# Altium PCB Driver Main Board-v1.0.PcbDoc (part 1 of 5)
Units mm, origin at the board's own origin, x right, y up, seen from the top; angles counter-clockwise.
Board outline 150 x 100 mm, 4 copper layers (Top Layer, Layer 1, Layer 2, Bottom Layer), stack 1.566 mm thick; 282 components, 222 nets, 936 pads, 397 vias.
Unrouted connection lines stored in the file: 249.
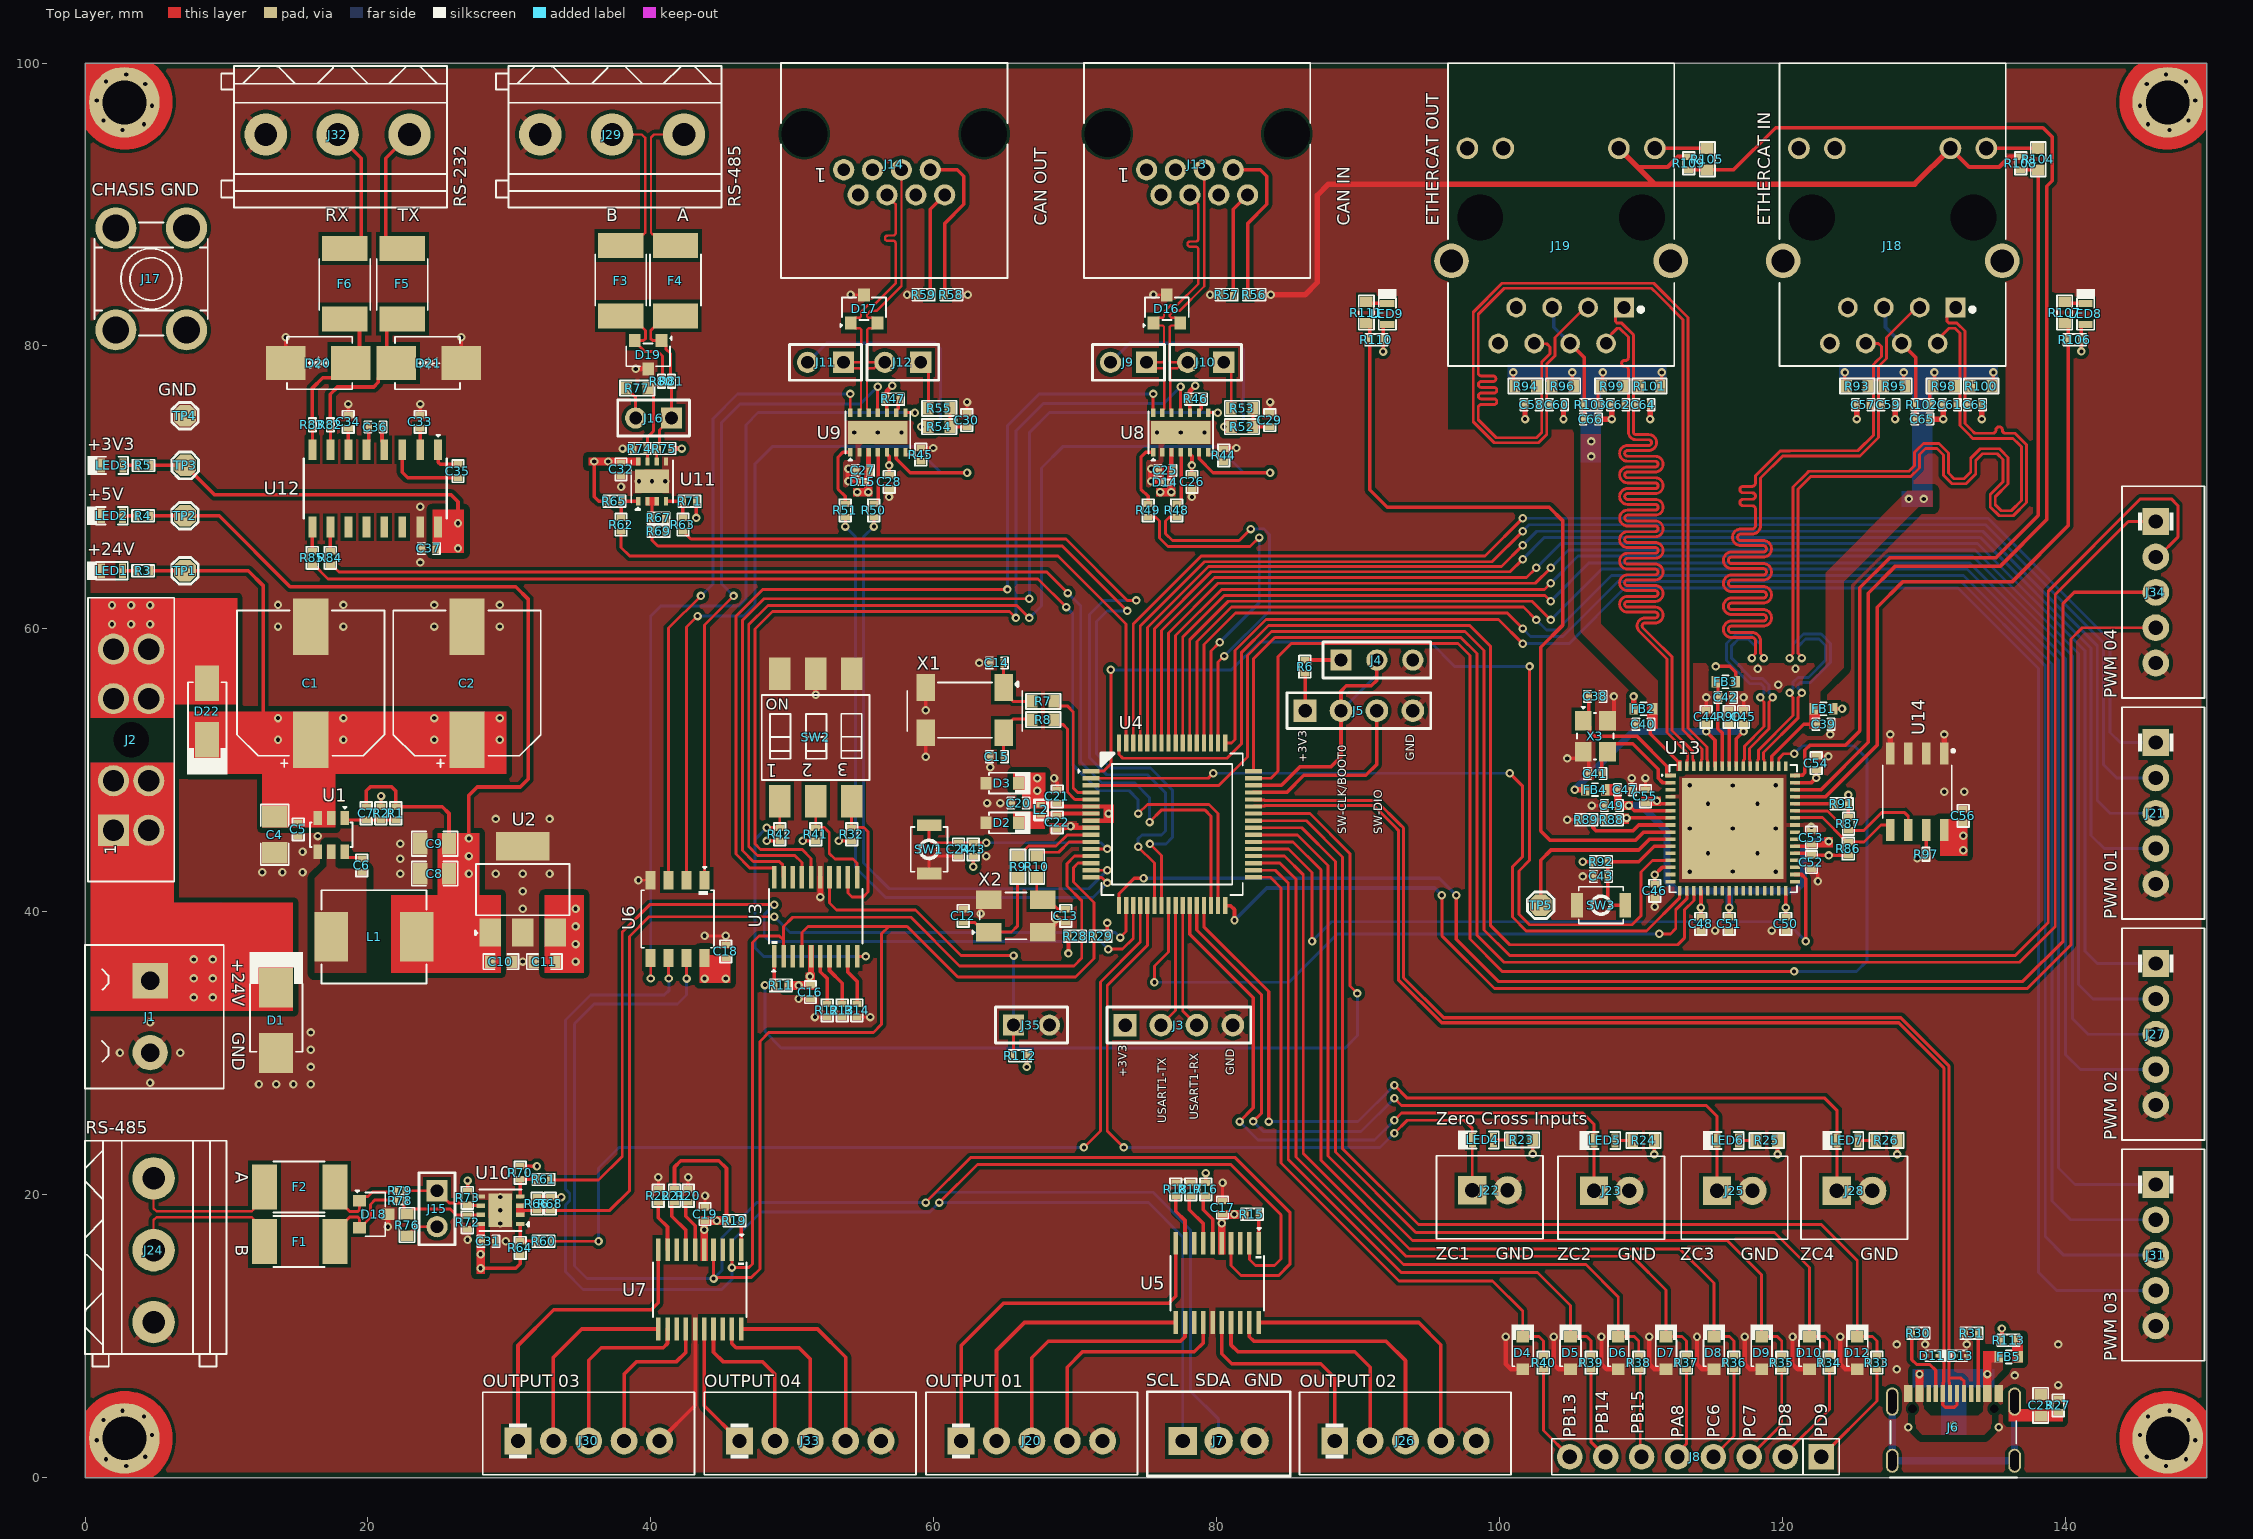
[diagram p0: Top Layer view]
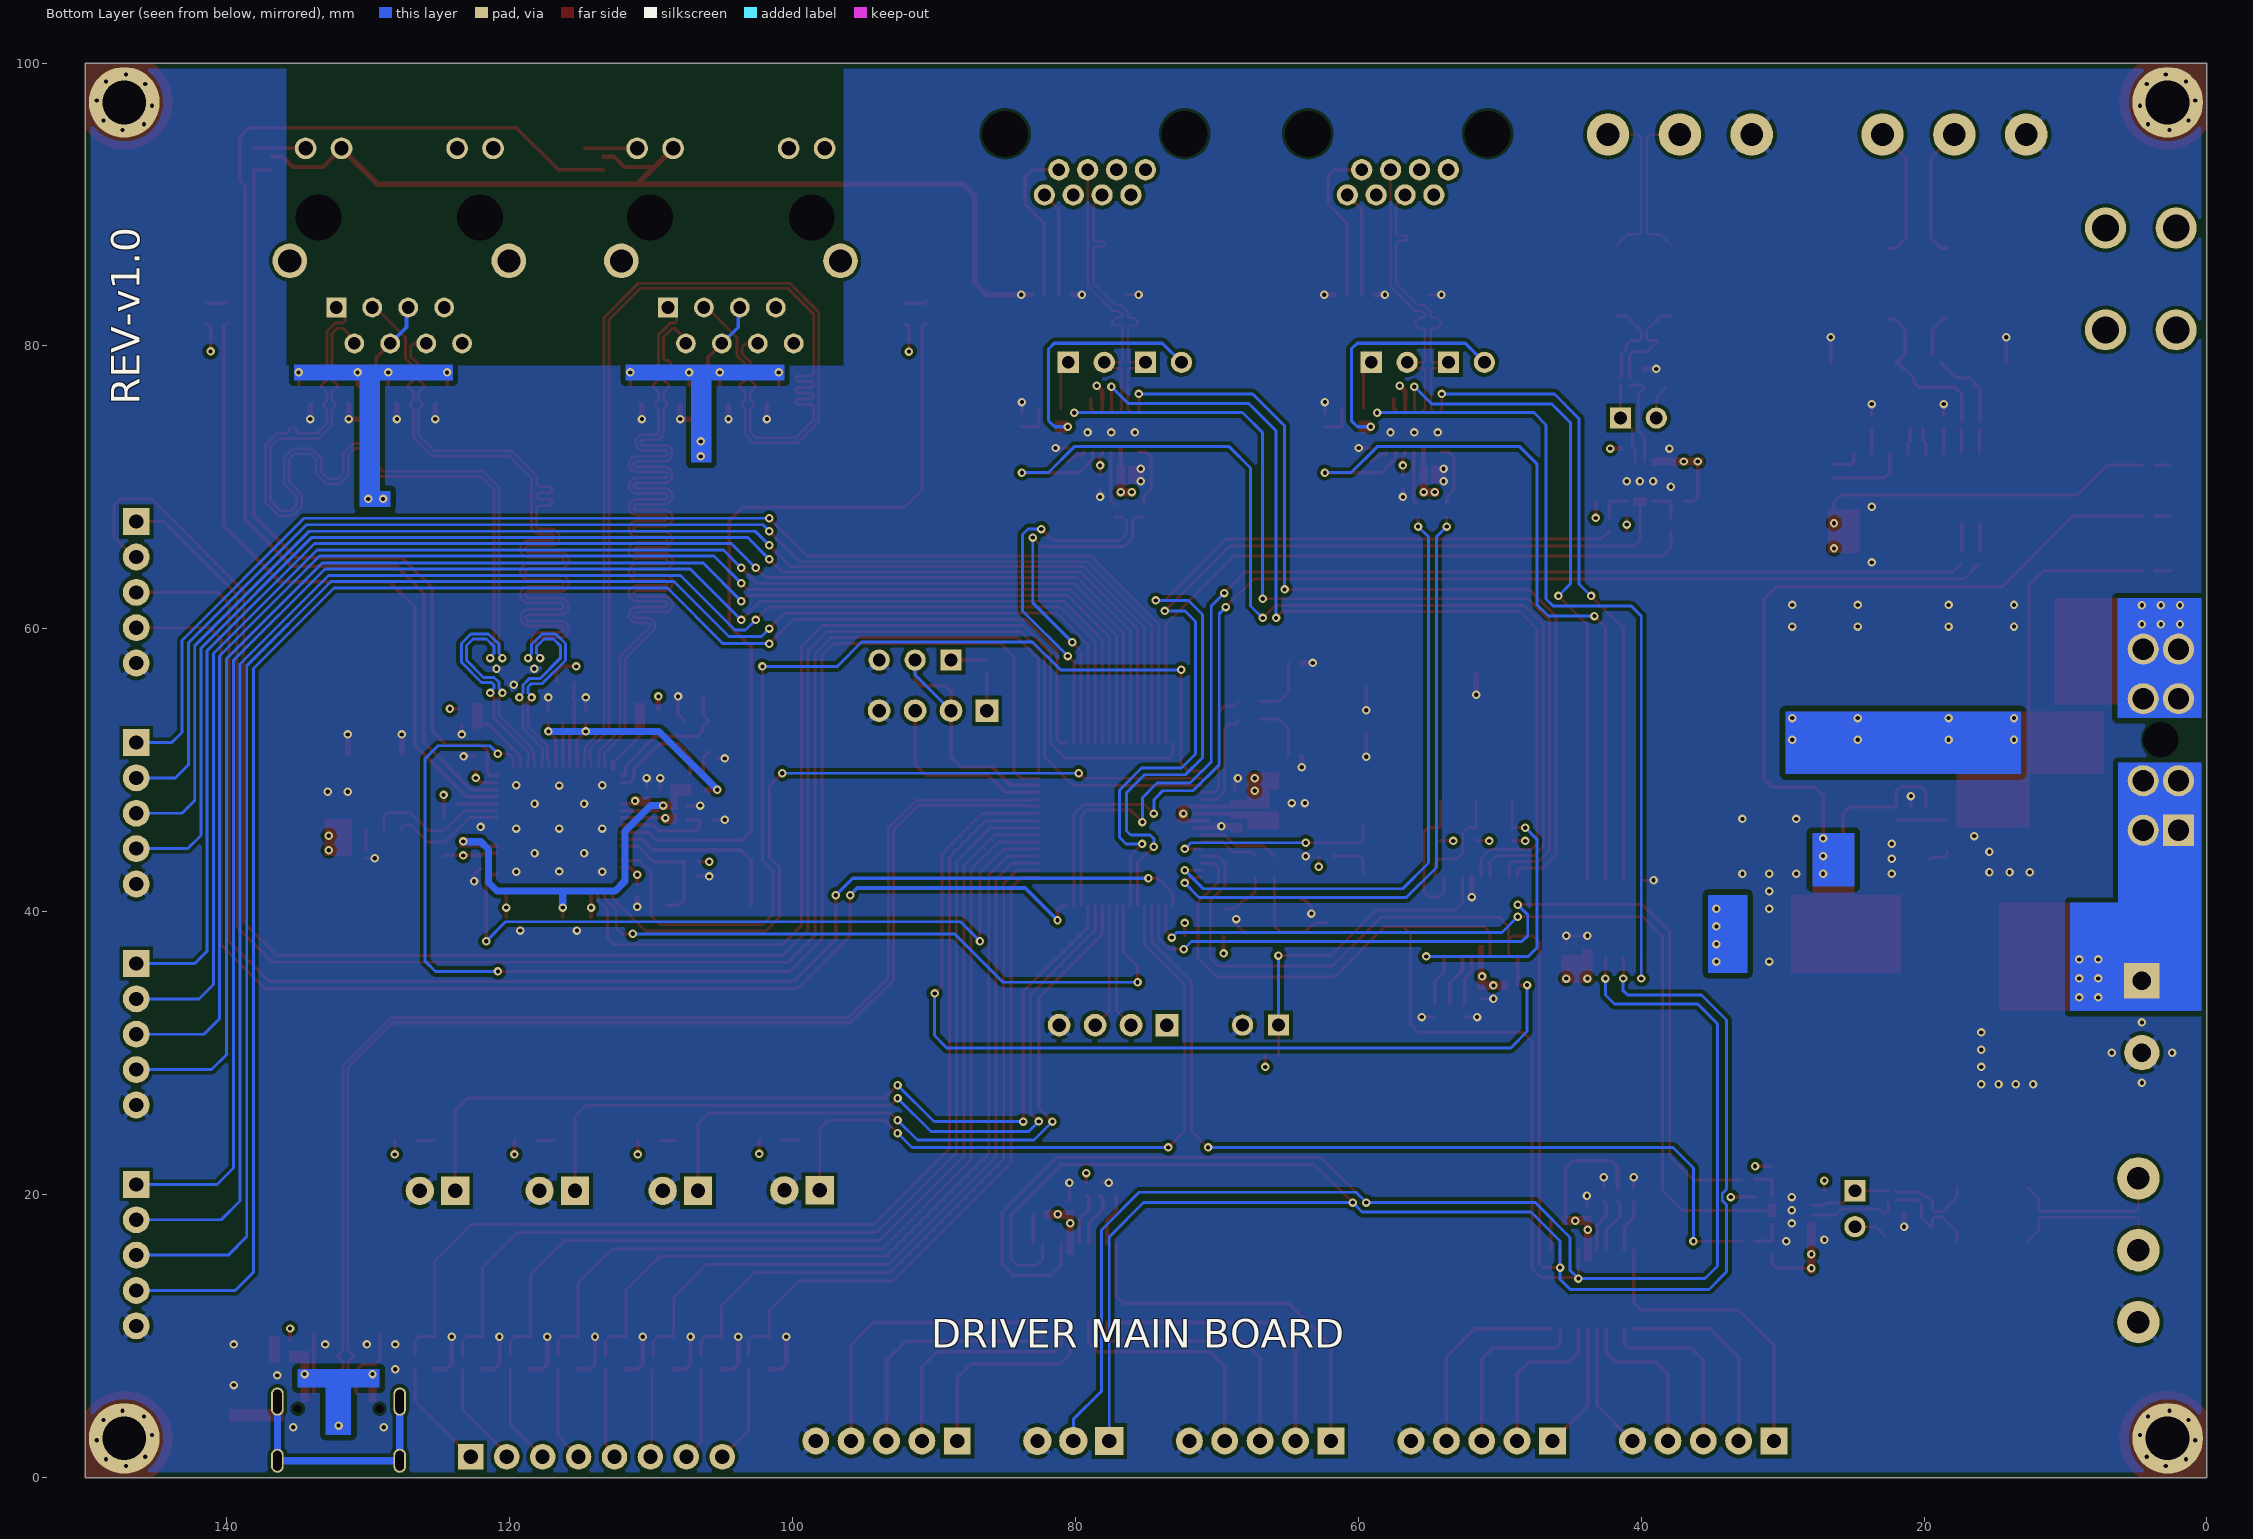
[diagram p1: Bottom Layer view, seen from below]
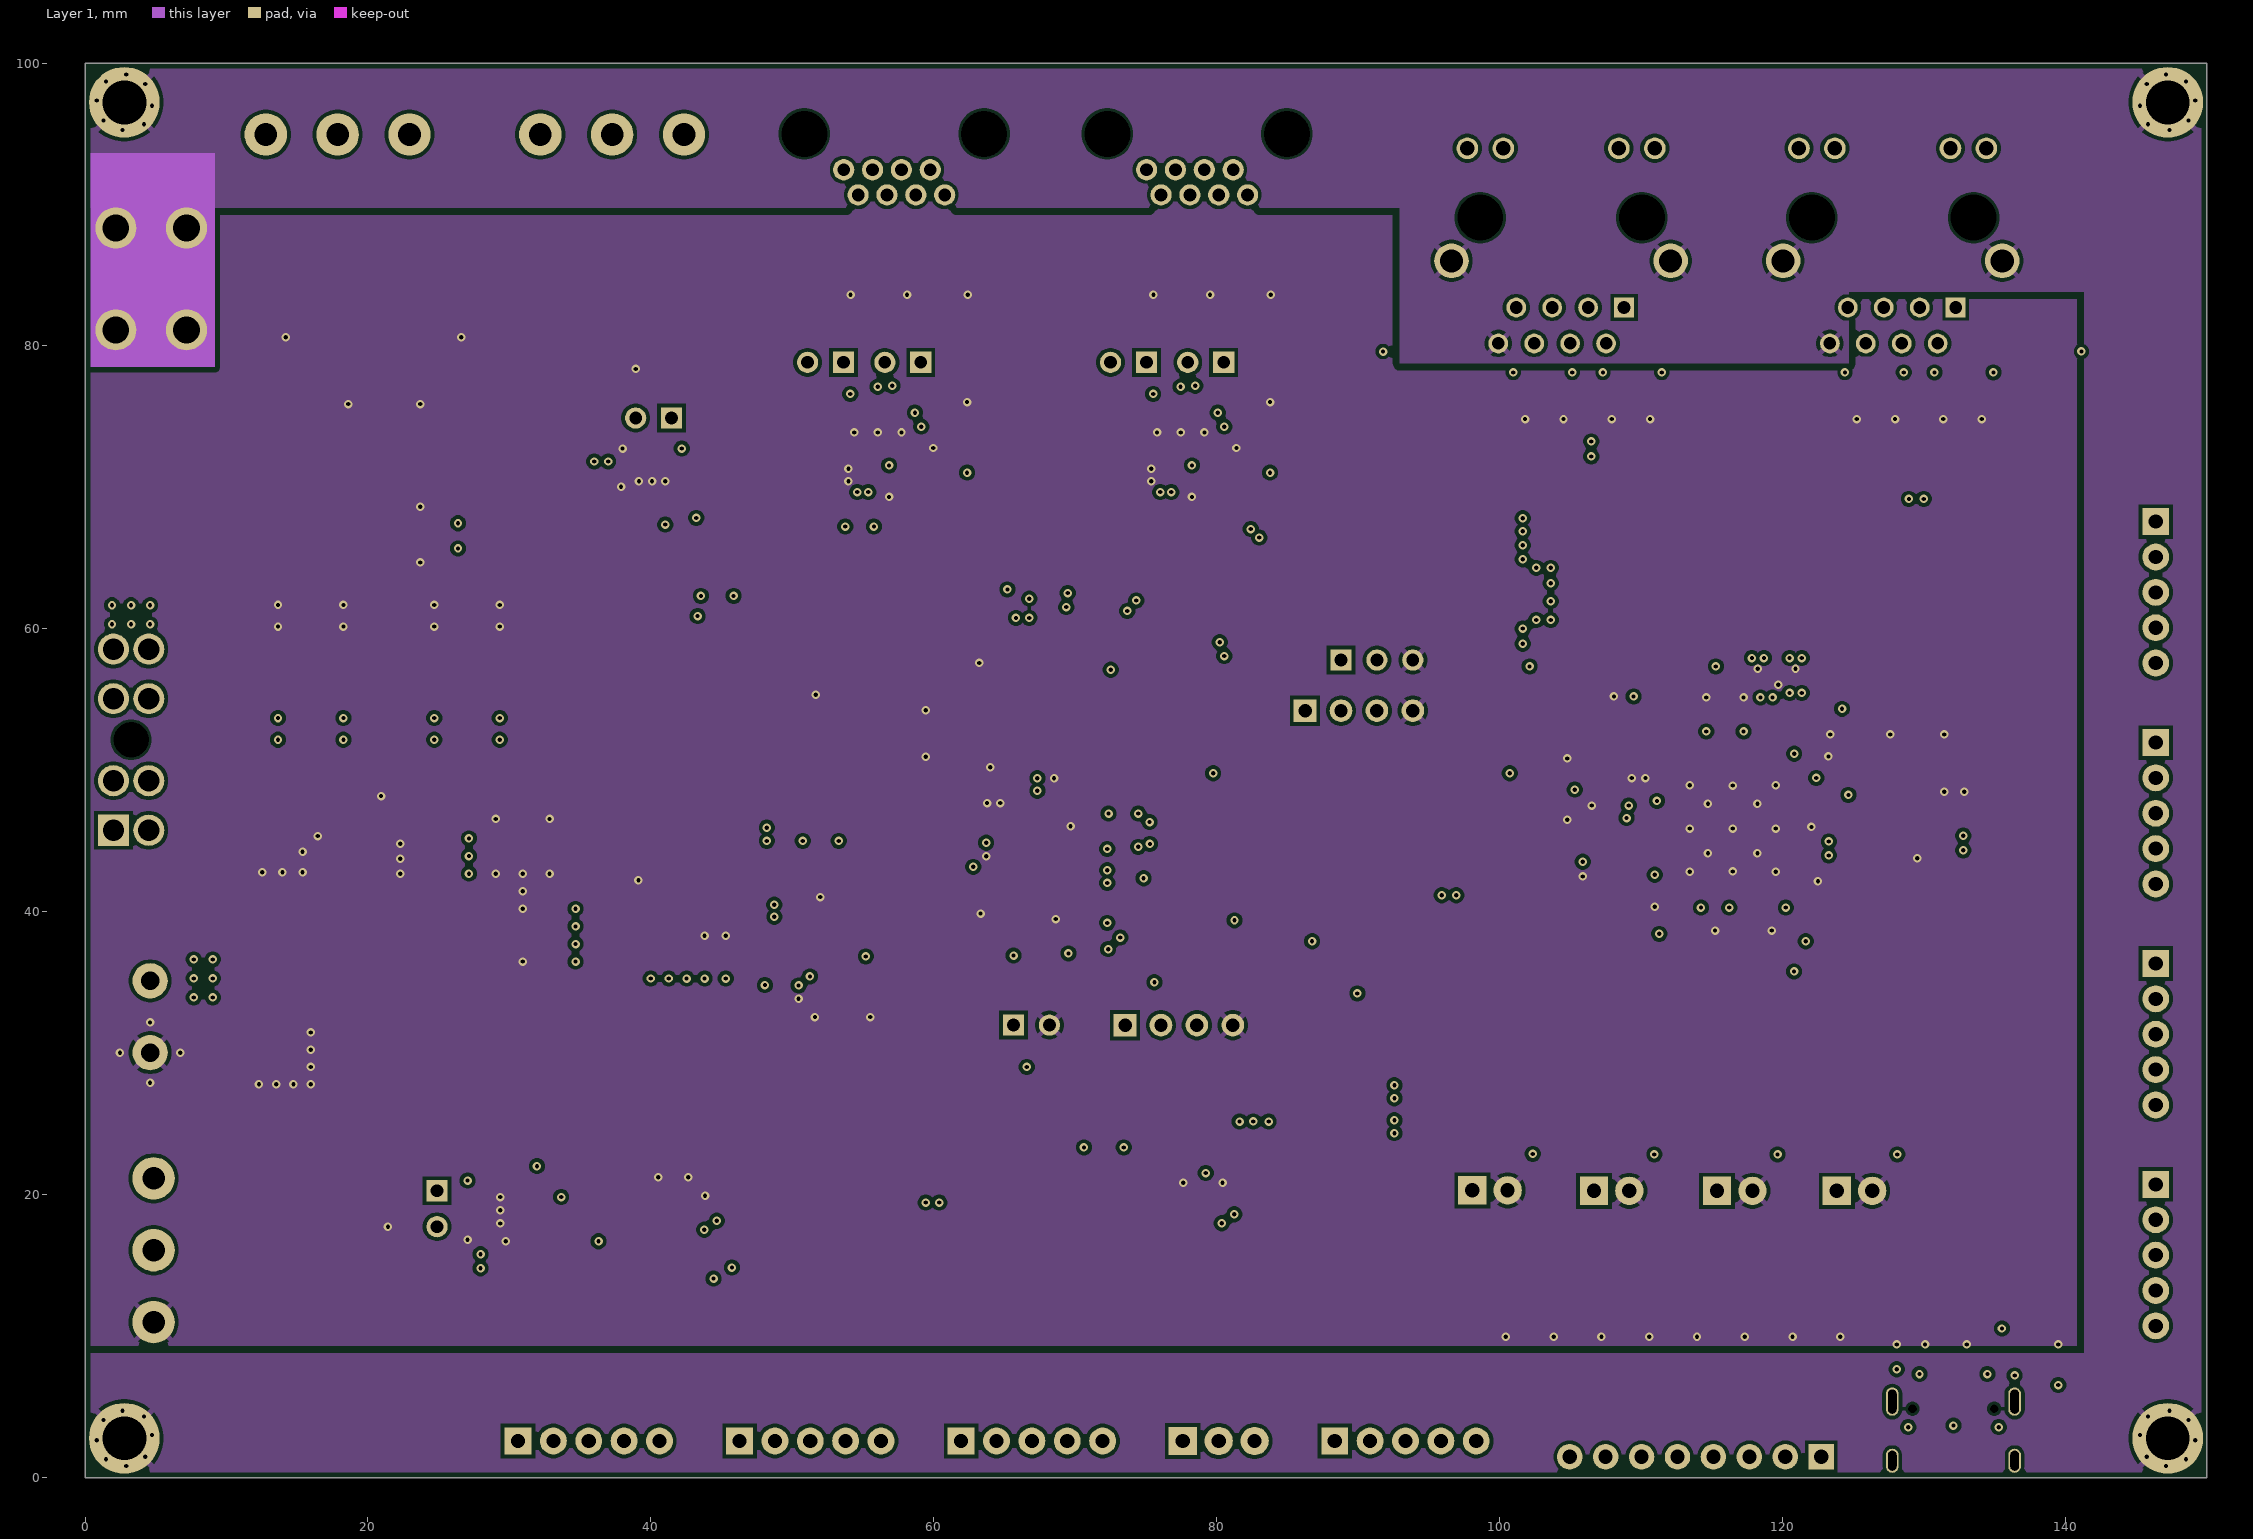
[diagram p2: Layer 1]
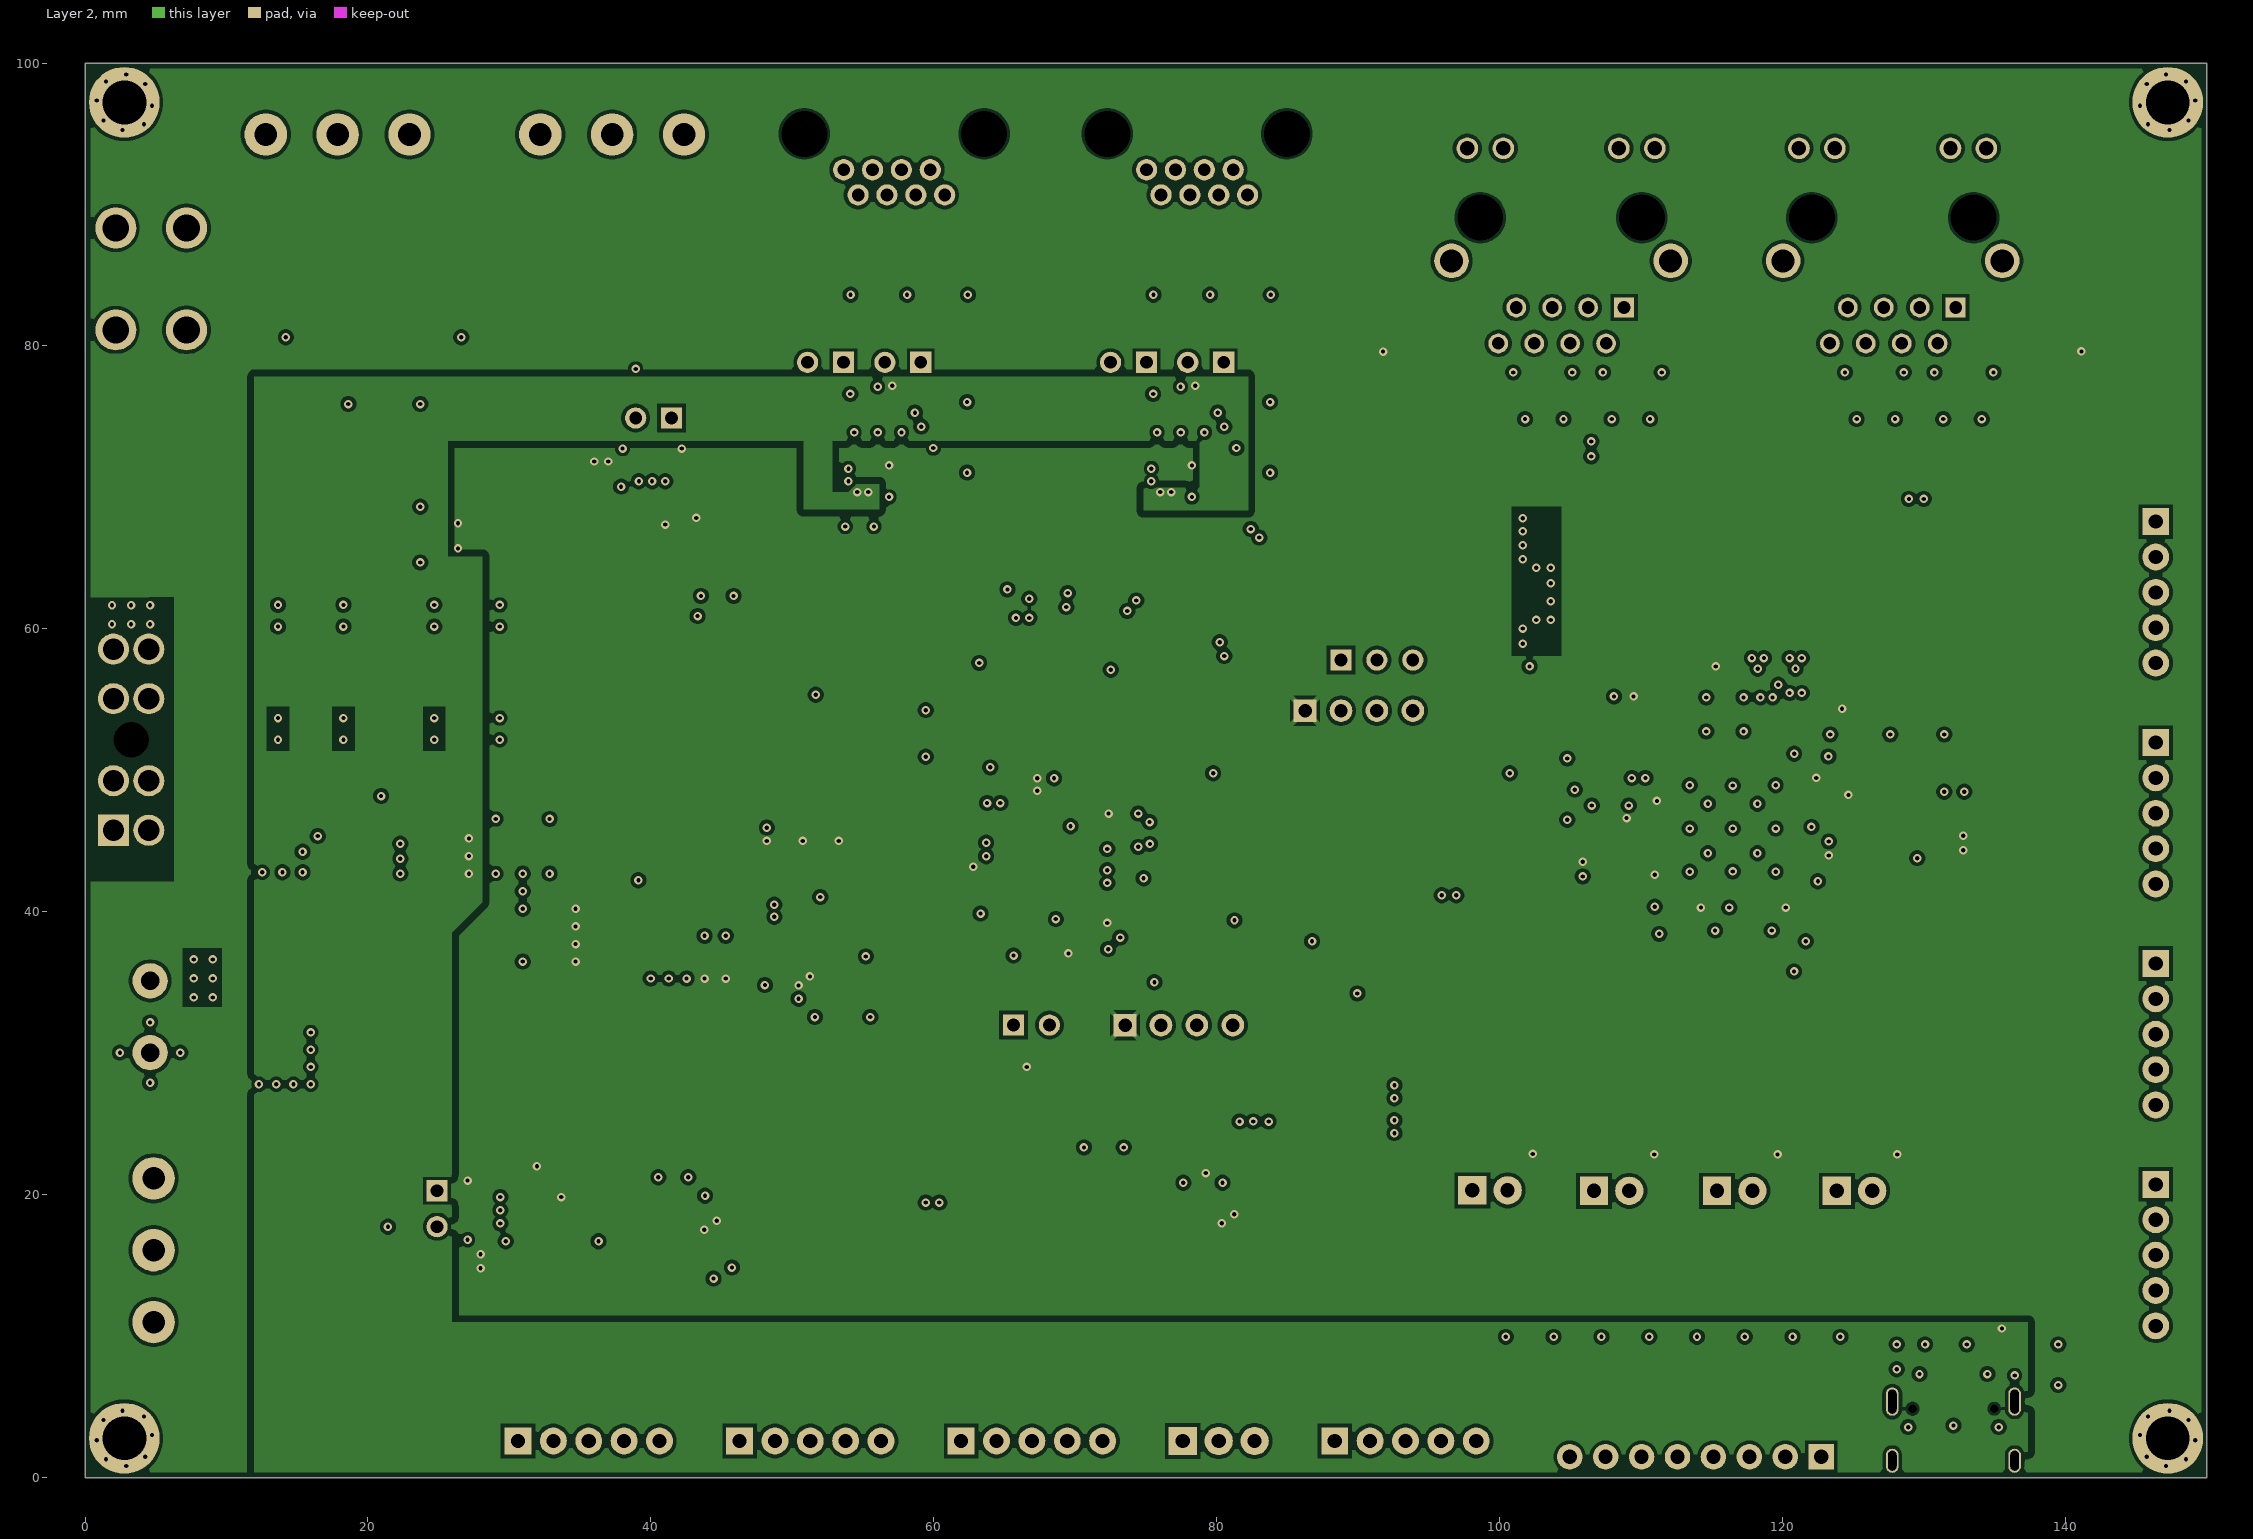
[diagram p3: Layer 2]
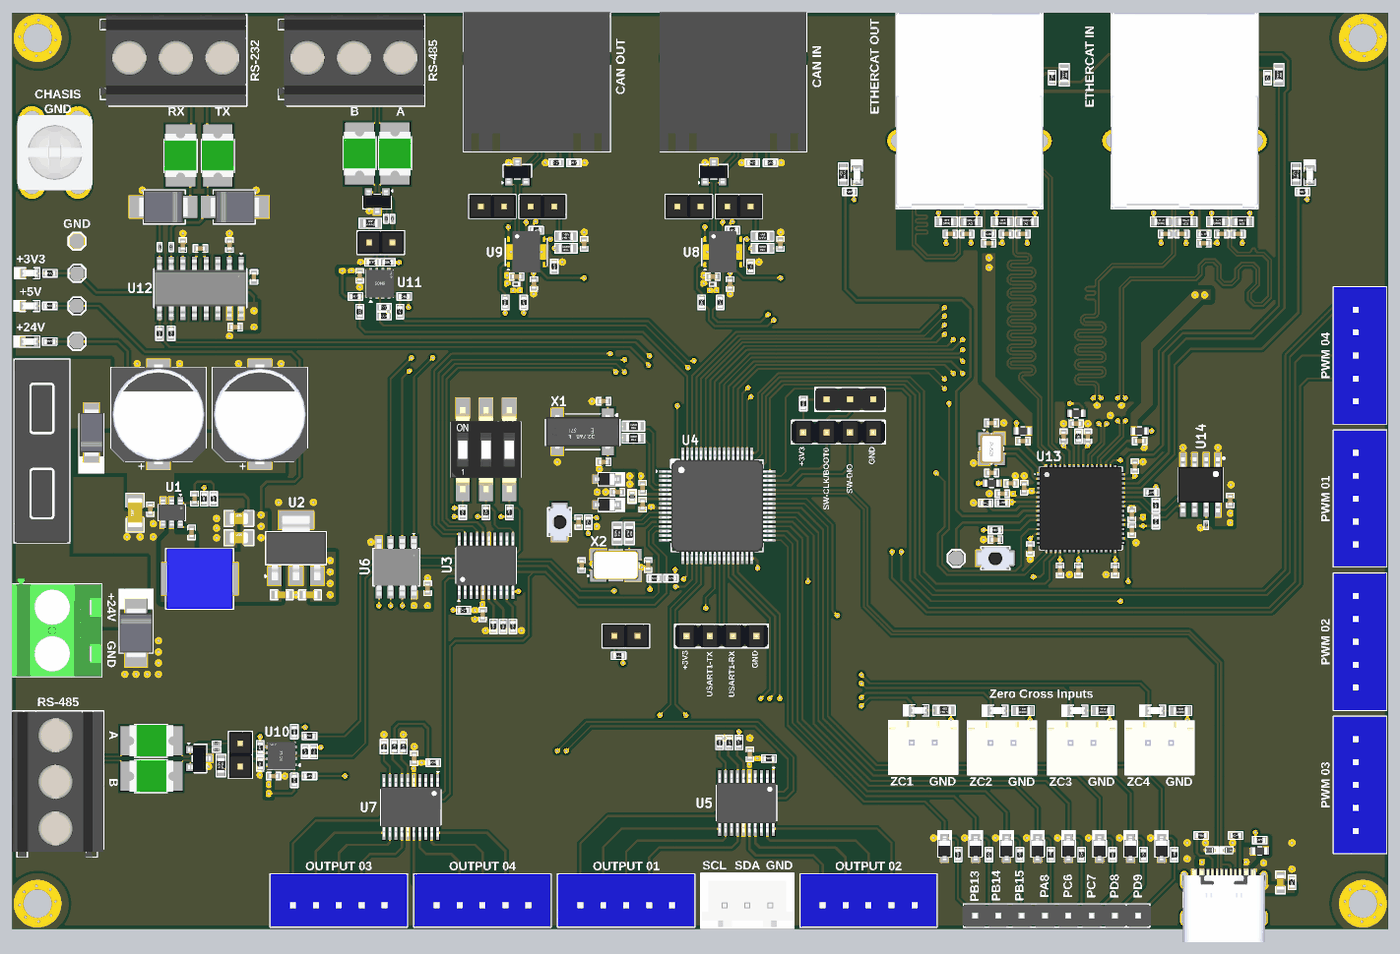
[diagram p6: 3D render of the assembled board from above, using the file's embedded part models]

## Layer stack, top to bottom
Top Solder: solder mask 0.02, Solder Resist, Dk 3.5
Top Layer: signal copper 0.035
Dielectric 2: prepreg 0.203, PP-006, Dk 4.4
Layer 1: signal copper 0.03
Dielectric 1: core 1.03, FR-4, Dk 4.6
Layer 2: signal copper 0.03
Dielectric 3: prepreg 0.203, PP-006, Dk 4.4
Bottom Layer: signal copper 0.035
Bottom Solder: solder mask 0.02, Solder Resist, Dk 3.5

## Board outline
0,0 0,100 150,100 150,0

## Design rules (kind name [scope] priority, off if disabled: settings)
BoardOutlineClearance [All] p1: gap=0 ignorepadtopadclearanceinfootprint=FALSE except(0.127: Fill-OutlineEdge; 0.381: Poly-OutlineEdge)
Clearance Clearance_1 [All] p1: gap=0.254 ignorepadtopadclearanceinfootprint=FALSE except(0.127: Arc-Arc Arc-Track Arc-THPad Track-Track Track-THPad; 0.152: SMDPad-Hole; 0.178: Arc-SMDPad Track-SMDPad SMDPad-SMDPad SMDPad-Fill Fill-Fill Fill-Hole Poly-Hole; 0.203: Track-Via Track-Fill; 0.381: Fill-Poly; 0.508: Poly-Poly)
Clearance [All] p2: gap=0.254 ignorepadtopadclearanceinfootprint=FALSE except(0.127: Arc-Arc Arc-Track Track-Track; 0.152: SMDPad-Hole; 0.178: Arc-SMDPad Track-SMDPad SMDPad-SMDPad SMDPad-Fill Fill-Fill Fill-Hole Poly-Hole; 0.203: Track-Via Track-Fill; 0.508: Poly-Poly)
DiffPairsRouting "RS485 120" [InDifferentialPairClass('RS485_LINES')] p1: maxlimit=0.254 minlimit=0.254 mostfreqgap=0.254 toplayer_minwidth=0.165 toplayer_maxwidth=0.165 toplayer_prefwidth=0.165 bottomlayer_minwidth=0.165 bottomlayer_maxwidth=0.165 bottomlayer_prefwidth=0.165 impedanceprofiledriven=TRUE impedanceprofileid={4FA95F63-EB2B-4DBC-8926-CD3603B1FDB7} impedanceprofilevalue=120.000000 maxuncoupledlength=12.7
DiffPairsRouting "RJ45 100" [InDifferentialPairClass('EtherCAT_A_Lines')] p2: maxlimit=0.254 minlimit=0.152 mostfreqgap=0.254 toplayer_maxgap=0.152 toplayer_prefgap=0.152 toplayer_minwidth=0.203 toplayer_maxwidth=0.203 toplayer_prefwidth=0.203 bottomlayer_maxgap=0.152 bottomlayer_prefgap=0.152 bottomlayer_minwidth=0.203 bottomlayer_maxwidth=0.203 bottomlayer_prefwidth=0.203 impedanceprofiledriven=TRUE impedanceprofileid={8A66B24F-BF74-4DA8-87EC-6CFF0AD57C52} impedanceprofilevalue=100.000000 maxuncoupledlength=12.7
DiffPairsRouting "CAN 120" [InDifferentialPairClass('CAN_Lines')] p3: maxlimit=0.254 minlimit=0.254 mostfreqgap=0.254 toplayer_minwidth=0.165 toplayer_maxwidth=0.165 toplayer_prefwidth=0.165 bottomlayer_minwidth=0.165 bottomlayer_maxwidth=0.165 bottomlayer_prefwidth=0.165 impedanceprofiledriven=TRUE impedanceprofileid={4FA95F63-EB2B-4DBC-8926-CD3603B1FDB7} impedanceprofilevalue=120.000000 maxuncoupledlength=12.7
DiffPairsRouting "USB 90" [InDifferentialPairClass('USB_PROGRAM_LINES')] p4: maxlimit=0.254 minlimit=0.127 mostfreqgap=0.254 toplayer_maxgap=0.127 toplayer_prefgap=0.127 toplayer_minwidth=0.229 toplayer_maxwidth=0.229 toplayer_prefwidth=0.229 bottomlayer_maxgap=0.127 bottomlayer_prefgap=0.127 bottomlayer_minwidth=0.229 bottomlayer_maxwidth=0.229 bottomlayer_prefwidth=0.229 impedanceprofiledriven=TRUE impedanceprofileid={DBDDFF14-6EC2-40F9-9D53-D59472D25E5F} impedanceprofilevalue=90.000000 maxuncoupledlength=12.7
HoleSize [All] p1: absolutevalues=TRUE maxlimit=3.302 minlimit=0.025 maxpercent=80.000 minpercent=20.000
MatchedLengths [InDifferentialPairClass('CAN_Lines')] p1: tolerance=0.508 checknetsindiffpair=TRUE checkdiffpairvsdiffpair=FALSE checkxsignals=FALSE checkothers=FALSE
MatchedLengths "Schematic Matched Net Lengths_2" [InDifferentialPairClass('USB_PROGRAM_LINES')] p2: tolerance=0.508 checknetsindiffpair=TRUE checkdiffpairvsdiffpair=FALSE checkxsignals=FALSE checkothers=FALSE
MatchedLengths "Schematic Matched Net Lengths_1" [InDifferentialPairClass('EtherCAT_A_Lines')] p3: tolerance=0.508 checknetsindiffpair=FALSE checkdiffpairvsdiffpair=TRUE checkxsignals=TRUE checkothers=TRUE
MatchedLengths "Schematic Matched Net Lengths" [InDifferentialPairClass('RS485_LINES')] p4: tolerance=0.508 checknetsindiffpair=TRUE checkdiffpairvsdiffpair=FALSE checkxsignals=FALSE checkothers=FALSE
MaxMinImpedance "Schematic Impedance Constraint_2" [InNetClass('RS485')] p1: minimum=115.0 maximum=125.0
MaxMinImpedance "Schematic Impedance Constraint_1" [InNetClass('EtherCAT_A')] p2: minimum=85.00 maximum=95.00
MaxMinImpedance "Schematic Impedance Constraint" [InNetClass('USB_PROGRAM')] p3: minimum=85.00 maximum=90.00
MinimumSolderMaskSliver [All] p1: minsoldermaskwidth=0
PolygonConnect [All] p1: thpad.connectstyle=Relief thpad.reliefconductorwidth=0.381 thpad.reliefentries=4 thpad.polygonreliefangle="45 Angle" thpad.airgapwidth=0.254 smdpad.connectstyle=Direct smdpad.reliefconductorwidth=0.254 smdpad.reliefentries=4 smdpad.polygonreliefangle="90 Angle" smdpad.airgapwidth=0.254 via.connectstyle=Direct via.reliefconductorwidth=0.254 via.reliefentries=4 via.polygonreliefangle="90 Angle" via.airgapwidth=0.254
RoutingVias [All] p1: holewidth=0.3 width=0.6 viastyle="Through Hole" minholewidth=0.3 minwidth=0.6 maxholewidth=0.3 maxwidth=0.6
SilkToSilkClearance [All] p1: silktosilkclearance=0
SilkToSolderMaskClearance [IsPad] p1: minsilkscreentomaskgap=0 clearancetoexposedcopper=TRUE
SolderMaskExpansion [All] p1: expansion=0.102 istentingtop=FALSE
SupplyNets "Schematic Supply Nets_9" [InNet('VDD33TXRX1')] p1: voltage=0.000
SupplyNets "Schematic Supply Nets_8" [InNet('+3V3')] p2: voltage=0.000
SupplyNets "Schematic Supply Nets_7" [InNet('VDD33TXRX2')] p3: voltage=0.000
SupplyNets "Schematic Supply Nets_6" [InNet('CHASIS GND')] p4: voltage=0.000
SupplyNets "Schematic Supply Nets_5" [InNet('GND')] p5: voltage=0.000
SupplyNets "Schematic Supply Nets_4" [InNet('+5V')] p6: voltage=0.000
SupplyNets "Schematic Supply Nets_3" [InNet('VBUS')] p7: voltage=0.000
SupplyNets "Schematic Supply Nets_2" [InNet('+24V')] p8: voltage=0.000
SupplyNets "Schematic Supply Nets_1" [InNet('VDDCR')] p9: voltage=0.000
SupplyNets "Schematic Supply Nets" [InNet('VDD12TX1')] p10: voltage=0.000
UnRoutedNet [All] p1: checkbadconnections=TRUE
Width [All] p1: maxlimit=0.508 minlimit=0.203 preferedwidth=0.254 midlayer1_minwidth=0.254 midlayer1_maxwidth=0.254 midlayer2_minwidth=0.254 midlayer2_maxwidth=0.254 minimp=50.000000 maximp=50.000000 favimp=50.000000
24 further rules are at their usual default settings.

## Classes and differential pairs
differential pair class USB_PROGRAM_LINES: USB
differential pair class RS485_LINES: RS485 RS485-2
differential pair class EtherCAT_A_Lines: RXA RXB TXA TXB
differential pair class CAN_Lines: CAN1 CAN2
net class USB_PROGRAM: USB_N USB_P
net class RS485: RS485-2_N RS485-2_P RS485_N RS485_P
net class EtherCAT_A: RXA_N RXA_P RXB_N RXB_P TXA_N TXA_P TXB_N TXB_P
net class CAN: CAN1_N CAN1_P CAN2_N CAN2_P
component class U_RS485-RS232-Sheet: C31 C32 C33 C34 C35 C36 C37 D18 D19 D20 D21 F1 F2 F3 F4 F5 F6 J15 J16 R60 R61 R62 R63 R64 R65 R66 R67 R68 R69 R70 R71 R72 R73 R74 R75 R76 R77 R78 R79 R80 R81 R82 R83 R84 R85 U10 U11 U12
component class U_Power_Sheet: C1 C2 C4 C5 C6 C7 C8 C9 C10 C11 D1 D22 J1 J2 L1 LED1 LED2 LED3 R1 R2 R3 R4 R5 TP1 TP2 TP3 TP4 U1 U2
component class U_EtherCAT-Sheet: C38 C39 C40 C41 C42 C43 C44 C45 C46 C47 C48 C49 C50 C51 C52 C53 C54 C55 C56 C57 C58 C59 C60 C61 C62 C63 C64 C65 C66 FB1 FB2 FB3 FB4 J17 J18 J19 LED8 LED9 R86 R87 R88 R89 R90 R91 R92 R93 R94 R95 R96 R97 R98 R99 R100 R101 R102 R103 R104 R105 R106 R107 R108 R109 R110 R111 SW3 TP5 U13 U14 X3
component class U_Controller-Sheet: C12 C13 C14 C15 C16 C17 C18 C19 C20 C21 C22 C23 C24 D2 D3 D4 D5 D6 D7 D8 D9 D10 D11 D12 D13 FB5 J3 J4 J5 J6 J7 J8 J35 L2 LED4 LED5 LED6 LED7 R6 R7 R8 R9 R10 R11 R12 R13 R14 R15 R16 R17 R18 R19 R20 R21 R22 R23 R24 R25 R26 R27 R28 R29 R30 R31 R32 R33 R34 R35 R36 R37 R38 R39 R40 R41 R42 R43 R112 R113 SW1 SW2 U3 U4 U5 U6 U7 X1 X2
component class U_Connector-Sheet: J20 J21 J22 J23 J24 J25 J26 J27 J28 J29 J30 J31 J32 J33 J34
component class U_CAN_Sheet: C25 C26 C27 C28 C29 C30 D14 D15 D16 D17 J9 J10 J11 J12 J13 J14 R44 R45 R46 R47 R48 R49 R50 R51 R52 R53 R54 R55 R56 R57 R58 R59 U8 U9
differential pair USB: +USB_P -USB_N
differential pair TXB: +TXB_P -TXB_N
differential pair TXA: +TXA_P -TXA_N
differential pair RXB: +RXB_P -RXB_N
differential pair RXA: +RXA_P -RXA_N
differential pair RS485: +RS485_P -RS485_N
differential pair RS485-2: +RS485-2_P -RS485-2_N
differential pair CAN2: +CAN2_P -CAN2_N
differential pair CAN1: +CAN1_P -CAN1_N

## Components (designator, comment, footprint, x,y, rotation, side; value= is the part's Value field where it differs from the comment)
C1 "220uF" UCD-220uF-10mmDia 15.951,56.159 r90 top
C2 "220uF" UCD-220uF-10mmDia 27,56.159 r90 top
C4 "10uF" Cap-1206 13.411,45.441 r90 top
C5 "100nF" cap-0402 15.062,45.822 r90 top
C6 "0.1uF" Cap-0402 19.565,43.28 r90 top
C7 "47pF" Cap-0402 19.882,46.966 r90 top
C8 "22uF" Cap-0805 24.714,42.697 r0 top
C9 "22uF" Cap-0805 24.714,44.806 r0 top
C10 "4.7uF" Cap-0603 29.399,36.477 r180 top
C11 "4.7uF" Cap-0603 32.475,36.477 r0 top
C12 "30pF" Cap-0402 62.083,39.715 r270 top
C13 "30pF" Cap-0402 69.322,39.715 r90 top
C14 "DNP" Cap-0402 64.462,57.594 r0 top value=6.8pF
C15 "DNP" Cap-0402 64.462,50.964 r180 top value=6.8pF
C16 "100nF" cap-0402 51.275,34.327 r90 top
C17 "100nF" cap-0402 80.409,19.086 r270 top
C18 "100nF" cap-0402 45.294,37.203 r270 top
C19 "100nF" cap-0402 43.827,18.63 r270 top
C20 "4.7uF" Cap-0402 65.986,47.688 r0 top
C21 "100nF" cap-0402 68.716,48.158 r270 top
C22 "0.1uF" Cap-0402 68.716,46.319 r90 top value=100nF
C23 "4.7nF" Cap-0603 138.243,5.107 r270 top
C24 "0.1uF" Cap-0402 61.749,44.409 r90 top value=100nF
C25 "0.1uF" Cap-0402 76.374,71.196 r180 top value=100nF
C26 "0.1uF" Cap-0402 78.256,70.383 r90 top value=100nF
C27 "0.1uF" Cap-0402 54.99,71.196 r180 top value=100nF
C28 "0.1uF" Cap-0402 56.857,70.383 r90 top value=100nF
C29 "4.7nF" Cap-0402 83.742,74.764 r90 top
C30 "4.7nF" Cap-0402 62.33,74.764 r90 top
C31 "0.1uf" Cap-0402 28.509,16.708 r180 top
C32 "0.1uf" Cap-0402 37.892,71.279 r90 top
C33 "0.1uf" Cap-0402 23.694,74.638 r270 top
C34 "0.1uf" Cap-0402 18.614,74.638 r270 top
C35 "0.1uf" Cap-0402 26.364,71.158 r270 top
C36 "0.1uf" Cap-0402 20.519,74.27 r180 top
C37 "0.1uf" Cap-0402 24.306,65.684 r0 top
C38 "30pF" Cap-0402 106.757,55.223 r180 top
C39 "100nF" cap-0402 122.897,53.257 r180 top
C40 "100nF" cap-0402 110.167,53.257 r0 top
C41 "30pF" Cap-0402 106.757,49.772 r0 top
C42 "100nF" cap-0402 115.982,55.153 r180 top
C43 "100nF" cap-0402 107.165,42.5 r0 top
C44 "100nF" cap-0402 114.603,53.778 r270 top
C45 "100nF" cap-0402 117.241,53.778 r270 top
C46 "100nF" cap-0402 110.967,41.471 r90 top
C47 "1uF" Cap-0402 108.867,48.635 r180 top
C48 "100nF" cap-0402 114.224,39.138 r90 top
C49 "470pF" Cap-0402 107.927,47.51 r0 top
C50 "100nF" cap-0402 120.224,39.138 r90 top
C51 "100nF" cap-0402 116.224,39.138 r90 top
C52 "100nF" cap-0402 122.037,43.513 r90 top
C53 "100nF" cap-0402 122.037,45.247 r270 top
C54 "100nF" cap-0402 122.38,50.514 r270 top
C55 "100nF" cap-0402 110.302,48.165 r270 top
C56 "100nF" cap-0402 132.769,46.78 r270 top
C57 "10pF" Cap-0402 125.703,75.844 r0 top
C58 "10pF" Cap-0402 102.263,75.844 r0 top
C59 "10pF" Cap-0402 127.482,75.844 r180 top
C60 "10pF" Cap-0402 104.042,75.844 r180 top
C61 "10pF" Cap-0402 131.825,75.844 r0 top
C62 "10pF" Cap-0402 108.385,75.844 r0 top
C63 "10pF" Cap-0402 133.603,75.844 r180 top
C64 "10pF" Cap-0402 110.163,75.844 r180 top
C65 "22nF" Cap-0402 129.882,74.828 r180 top
C66 "22nF" Cap-0402 106.442,74.828 r180 top
D1 "SMBJ28A-13-F" SMB_ 13.513,32.32 r90 top value=330pF
D2 "SD03" SOD-323 64.836,46.289 r180 top
D3 "SD03" SOD-323 64.836,49.089 r180 top
D4 "MM3Z3V3" SOD-323 101.63,8.818 r270 top
D5 "MM3Z3V3" SOD-323 105.008,8.818 r270 top
D6 "MM3Z3V3" SOD-323 108.386,8.818 r270 top
D7 "MM3Z3V3" SOD-323 111.765,8.818 r270 top
D8 "MM3Z3V3" SOD-323 115.143,8.818 r270 top
D9 "MM3Z3V3" SOD-323 118.521,8.818 r270 top
D10 "MM3Z3V3" SOD-323 121.899,8.818 r270 top
D11 "ESD9L5.0ST5G" SOD-923. 130.564,8.612 r180 top
D12 "MM3Z3V3" SOD-323 125.277,8.818 r270 top
D13 "ESD9L5.0ST5G" SOD-923. 132.597,8.612 r0 top
D14 "PESD5V0H1BSFYL" DSN0603-2 76.374,70.358 r180 top
D15 "PESD5V0H1BSFYL" DSN0603-2 54.964,70.383 r180 top
D16 "CDSOT23-T24CAN-Q" SOT-23 76.478,82.617 r0 top
D17 "CDSOT23-T24CAN-Q" SOT-23 55.066,82.617 r0 top
D18 "SM712" SOT-23 20.414,18.616 r270 top
D19 "SM712" SOT-23 39.8,79.375 r180 top
D20 "SMBJ8.0CA" "SMB Bi Directional" 16.495,78.791 r0 top
D21 "SMBJ8.0CA" "SMB Bi Directional" 24.295,78.791 r180 top
D22 "SS56" SMA 8.636,54.159 r90 top
F1 "MF-MSMF010-2" Fuse-1812_ 15.182,16.686 r180 top
F2 "MF-MSMF010-2" Fuse-1812_ 15.182,20.547 r180 top
F3 "MF-MSMF010-2" Fuse-1812_ 37.87,84.607 r90 top
F4 "MF-MSMF010-2" Fuse-1812_ 41.731,84.607 r90 top
F5 "MF-MSMF010-2" Fuse-1812_ 22.427,84.403 r270 top
F6 "MF-MSMF010-2" Fuse-1812_ 18.363,84.403 r270 top
FB1 "BLM18PG221SN1D" "IND-0603 (1608 Metric)" 122.897,54.347 r180 top value=100mR
FB2 "BLM18PG221SN1D" "IND-0603 (1608 Metric)" 110.167,54.347 r0 top value=100mR
FB3 "BLM18PG221SN1D" "IND-0603 (1608 Metric)" 115.982,56.254 r180 top value=100mR
FB4 "BLM18PG221SN1D" "IND-0603 (1608 Metric)" 106.757,48.635 r180 top value=100mR
FB5 "BLM18PG221SN1D" "IND-0603 (1608 Metric)" 135.977,8.536 r0 top value=100mR
J1 "1715721" 1715721 4.6,32.583 r270 top
J2 "178.6165.0002" 178.6165.0002 3.257,52.165 r90 top
J3 "X6511WV-04H-C60D30" HDR1X4_ 73.517,31.991 r0 top
J4 "68000-103HLF" HDR1X3_ 88.782,57.797 r0 top
J5 "X6511WV-04H-C60D30" HDR1X4_ 86.242,54.216 r0 top
J6 "TYPE-C-31-M-12" TYPE-C-31-M-12_ 132.077,3.57 r0 top
J7 "B3B-XH-A(LF)(SN)" B3B-XH-A(LF)(SN)_ 81.407,2.591 r0 top
J8 "X6511WV-08H-C60D30" "HDR 1x8 TH male" 113.841,1.475 r180 top
J9 "X6511WV-02H-C60D30" HDR1X2_ 75.03,78.842 r180 top
J10 "X6511WV-02H-C60D30" HDR1X2_ 80.491,78.842 r180 top
J11 "X6511WV-02H-C60D30" HDR1X2_ 53.618,78.842 r180 top
J12 "X6511WV-02H-C60D30" HDR1X2_ 59.079,78.842 r180 top
J13 "X12ADIWA3DY1027" X12ADIWA3DY1027 78.612,92.836 r180 top
J14 "X12ADIWA3DY1027" X12ADIWA3DY1027 57.199,92.836 r180 top
J15 "X6511WV-02H-C60D30" HDR1X2_ 24.884,20.278 r270 top
J16 "X6511WV-02H-C60D30" HDR1X2_ 41.462,74.905 r180 top
J17 "T44001" T44001 4.674,84.734 r0 top
J18 "HR911105A" HR911105A 127.782,87.071 r0 top
J19 "HR911105A" HR911105A 104.342,87.071 r0 top
J20 "B5B-XH-A(LF)(SN)" B5B-XH-A(LF)(SN)_ 66.933,2.591 r0 top
J21 "B5B-XH-A(LF)(SN)" B5B-XH-A(LF)(SN)_ 146.38,46.963 r270 top
J22 "B2B-XH-A(LF)(SN)" B2B-XH-A(LF)(SN)_ 99.316,20.312 r0 top
J23 "B2B-XH-A(LF)(SN)" B2B-XH-A(LF)(SN)_ 107.913,20.277 r0 top
J24 "DB128L-5.08-3P-BK-S" DB128L-5.08-3P-BK-S 4.844,16.076 r270 top
J25 "B2B-XH-A(LF)(SN)" B2B-XH-A(LF)(SN)_ 116.62,20.277 r0 top
J26 "B5B-XH-A(LF)(SN)" B5B-XH-A(LF)(SN)_ 93.341,2.591 r0 top
J27 "B5B-XH-A(LF)(SN)" B5B-XH-A(LF)(SN)_ 146.38,31.345 r270 top
J28 "B2B-XH-A(LF)(SN)" B2B-XH-A(LF)(SN)_ 125.083,20.277 r0 top
J29 "DB128L-5.08-3P-BK-S" DB128L-5.08-3P-BK-S 37.26,94.945 r180 top
J30 "B5B-XH-A(LF)(SN)" B5B-XH-A(LF)(SN)_ 35.604,2.591 r0 top
J31 "B5B-XH-A(LF)(SN)" B5B-XH-A(LF)(SN)_ 146.38,15.726 r270 top
J32 "DB128L-5.08-3P-BK-S" DB128L-5.08-3P-BK-S 17.855,94.945 r180 top
J33 "B5B-XH-A(LF)(SN)" B5B-XH-A(LF)(SN)_ 51.269,2.591 r0 top
J34 "B5B-XH-A(LF)(SN)" B5B-XH-A(LF)(SN)_ 146.38,62.582 r270 top
J35 "X6511WV-02H-C60D30" HDR1X2_ 65.634,31.991 r0 top
L1 "6.8uH" 0630CDMCCDS_6R8MC 20.431,38.227 r0 top
L2 "BLM15AG601SN1D" IND-0402 67.573,47.211 r270 top
LED1 "RED" LED-0603 1.897,64.11 r180 top
LED2 "RED" LED-0603 1.897,67.996 r180 top
LED3 "RED" LED-0603 1.922,71.552 r180 top
LED4 "Emerald" LED-0603 98.816,23.868 r180 top
LED5 "Emerald" LED-0603 107.413,23.833 r180 top
LED6 "Emerald" LED-0603 116.12,23.833 r180 top
LED7 "Emerald" LED-0603 124.583,23.833 r180 top
LED8 "Emerald" LED-0603 141.421,82.259 r90 top
LED9 "RED" LED-0603 92.056,82.259 r90 top
R1 "158K" Res-0402 21.971,46.965 r90 top
R2 "30.1K" Res-0402 20.927,46.965 r270 top
R3 "3.9K" Res-0402 4.106,64.11 r180 top value=3.9kR
R4 "470R" Res-0402 4.106,67.996 r180 top
R5 "200R" Res-0402 4.132,71.552 r180 top
R6 "10K" Res-0402 86.242,57.327 r270 top
R7 "DNP" Res-0603 67.726,54.876 r0 top
R8 "DNP" Res-0603 67.726,53.581 r0 top
R9 "0R" Res-0603 65.953,43.177 r90 top
R10 "0R" Res-0603 67.274,43.177 r90 top
R11 "10K" Res-0402 49.196,34.797 r0 top
R12 "10K" Res-0402 52.466,33.031 r270 top
R13 "10K" Res-0402 53.521,33.031 r270 top
R14 "10K" Res-0402 54.576,33.031 r270 top
R15 "10K" Res-0402 82.488,18.616 r180 top
R16 "10K" Res-0402 79.218,20.381 r90 top
R17 "10K" Res-0402 78.163,20.381 r90 top
R18 "10K" Res-0402 77.108,20.381 r90 top
R19 "10K" Res-0402 45.906,18.16 r180 top
R20 "10K" Res-0402 42.636,19.926 r90 top
R21 "10K" Res-0402 41.666,19.926 r90 top
R22 "10K" Res-0402 40.526,19.926 r90 top
R23 "49.9R" Res-0603 101.575,23.868 r180 top
R24 "49.9R" Res-0603 110.172,23.833 r180 top
R25 "49.9R" Res-0603 118.878,23.833 r180 top
R26 "49.9R" Res-0603 127.342,23.833 r180 top
R27 "1M" Res-0402 139.487,5.107 r90 top
R28 "4.7K" Res-0402 69.99,38.278 r180 top
R29 "4.7K" Res-0402 71.793,38.278 r0 top
R30 "5.1K" Res-0402 129.597,10.212 r0 top
R31 "5.1K" Res-0402 133.357,10.212 r180 top
R32 "10K" Res-0402 54.191,45.479 r270 top
R33 "33R" Res-0402 126.672,8.137 r270 top
R34 "33R" Res-0402 123.305,8.137 r270 top
R35 "33R" Res-0402 119.937,8.137 r270 top
R36 "33R" Res-0402 116.57,8.137 r270 top
R37 "33R" Res-0402 113.203,8.137 r270 top
R38 "33R" Res-0402 109.835,8.137 r270 top
R39 "33R" Res-0402 106.468,8.137 r270 top
R40 "33R" Res-0402 103.101,8.137 r270 top
R41 "10K" Res-0402 51.651,45.479 r270 top
R42 "10K" Res-0402 49.111,45.479 r270 top
R43 "10K" Res-0402 62.79,44.409 r270 top
R44 "100K" Res-0402 80.491,72.27 r270 top
R45 "100K" Res-0402 59.091,72.316 r270 top
R46 "33K" Res-0402 78.533,76.251 r0 top
R47 "33K" Res-0402 57.123,76.251 r0 top
R48 "0R" Res-0402 77.174,68.377 r270 top
R49 "0R" Res-0402 75.156,68.377 r270 top
R50 "0R" Res-0402 55.762,68.377 r270 top
R51 "0R" Res-0402 53.744,68.377 r270 top
R52 "60.4R" Res-0603 81.787,74.294 r0 top
R53 "60.4R" Res-0603 81.787,75.589 r180 top
R54 "60.4R" Res-0603 60.374,74.294 r0 top
R55 "60.4R" Res-0603 60.374,75.589 r180 top
R56 "0R" Res-0402 82.651,83.617 r180 top
R57 "0R" Res-0402 80.692,83.617 r0 top
R58 "0R" Res-0402 61.239,83.617 r180 top
R59 "0R" Res-0402 59.279,83.617 r0 top
R60 "0R" Res-0402 32.415,16.708 r180 top
R61 "0R" Res-0402 32.415,21.08 r180 top
R62 "0R" Res-0402 37.892,67.373 r90 top
R63 "0R" Res-0402 42.264,67.373 r90 top
R64 "4.7K" Res-0402 30.758,16.239 r270 top
R65 "4.7K" Res-0402 37.423,69.031 r180 top
R66 "4.7K" Res-0402 31.945,19.366 r90 top
R67 "4.7K" Res-0402 40.55,67.843 r0 top
R68 "4.7K" Res-0402 32.887,19.366 r90 top
R69 "4.7K" Res-0402 40.55,66.902 r0 top
R70 "4.7K" Res-0402 30.758,21.55 r90 top
R71 "4.7K" Res-0402 42.734,69.031 r0 top
R72 "4.7K" Res-0402 27.041,18.043 r270 top
R73 "4.7K" Res-0402 27.041,19.773 r270 top
R74 "4.7K" Res-0402 39.227,72.748 r180 top
R75 "4.7K" Res-0402 40.957,72.748 r180 top
R76 "120R" Res-0603 22.77,17.854 r270 top
R77 "120R" Res-0603 39.038,77.019 r180 top
R78 "22R" Res-0201 22.284,19.566 r180 top
R79 "22R" Res-0201 22.284,20.278 r180 top
R80 "22R" Res-0201 40.75,77.505 r90 top
R81 "22R" Res-0201 41.462,77.505 r90 top
R82 "22R" Res-0201 17.344,74.418 r270 top
R83 "22R" Res-0201 16.074,74.418 r270 top
R84 "0R" Res-0402 17.344,65.011 r270 top
R85 "0R" Res-0402 16.074,65.011 r270 top
R86 "4.7K" Res-0402 124.653,44.459 r270 top
R87 "4.7K" Res-0402 124.653,46.226 r90 top
R88 "DNP" Res-0402 107.927,46.51 r180 top
R89 "4.7K" Res-0402 106.124,46.51 r0 top
R90 "12.1k" Res-0402 116.224,53.778 r270 top
R91 "10K" Res-0402 124.183,47.635 r180 top
R92 "10K" Res-0402 107.165,43.542 r0 top
R93 "49.9R" Res-0603 125.271,77.165 r180 top
R94 "49.9R" Res-0603 101.832,77.165 r180 top
R95 "49.9R" Res-0603 127.914,77.165 r0 top
R96 "49.9R" Res-0603 104.474,77.165 r0 top
R97 "10K" Res-0201 130.152,44.067 r270 top
R98 "49.9R" Res-0603 131.393,77.165 r180 top
R99 "49.9R" Res-0603 107.953,77.165 r180 top
R100 "49.9R" Res-0603 134.034,77.165 r0 top
R101 "49.9R" Res-0603 110.595,77.165 r0 top
R102 "0R" Res-0402 129.882,75.844 r0 top
R103 "0R" Res-0402 106.442,75.844 r0 top
R104 "330R" Res-0603 138.073,93.204 r90 top
R105 "330R" Res-0603 114.68,93.204 r90 top
R106 "10K" Res-0402 140.651,80.447 r0 top
R107 "330R" Res-0603 139.94,82.36 r270 top
R108 "10K" Res-0402 136.828,92.912 r270 top
R109 "10K" Res-0402 113.359,92.912 r270 top
R110 "10K" Res-0402 91.286,80.442 r0 top
R111 "330R" Res-0603 90.575,82.36 r270 top
R112 "4.7K" Res-0402 66.103,29.821 r0 top
R113 "DNP" Res-0402 135.977,9.704 r180 top
SW1 "B3U-1000P" B3U-1000P 59.666,44.409 r90 top
SW2 "DSIC03LSGET" DSIC03LSGET 51.651,52.324 r90 top
SW3 "B3U-1000P" B3U-1000P 107.165,40.468 r0 top
TP1 "TEST POINT" Test-point 7.065,64.11 r0 top
TP2 "TEST POINT" Test-point 7.065,67.996 r0 top
TP3 "TEST POINT" Test-point 7.091,71.552 r0 top
TP4 "TEST POINT" Test-point 7.065,75.057 r0 top
TP5 "TEST POINT" Test-point 102.898,40.468 r0 top
U1 "AP63300WU-7" TSOT-23-6 17.399,45.441 r270 top
U2 "BL8071CLATR33" "SOT- 223" 30.937,41.581 r0 top
U3 "PCF8574APWR" TSSOP-20 51.651,39.648 r90 top
U4 "STM32G0B1RET6" LQFP-64(10x10) 76.844,46.189 r0 top
U5 "PCF8574APWR" TSSOP-20 80.033,13.765 r270 top
U6 "PCA9536D,118" SOP-8 41.89,39.483 r270 top
U7 "PCF8574APWR" TSSOP-20 43.451,13.309 r270 top
U8 "TCAN1463DMTRQ1" VSON-14(3x4.5) 77.454,73.886 r90 top
U9 "TCAN1463DMTRQ1" VSON-14(3x4.5) 56.041,73.886 r90 top
U10 "THVD2450DRBR" SON-8-EP(3x3) 29.358,18.901 r180 top
U11 "THVD2450DRBR" SON-8-EP(3x3) 40.085,70.431 r90 top
U12 "MAX3232ESE" SOP-16 20.519,69.926 r270 top
U13 "LAN9253-SVB QFN64" QFN-64-EP(9x9) 116.474,45.885 r0 top
U14 "CAT24C256WI-GT3" CAT24C256WI-GT3 129.517,48.482 r270 top
X1 "DNP" MC-306 62.182,54.254 r180 top value=32.786kHz
X2 "8MHz" 5TJ480000XYLBC_ 65.791,39.715 r0 top
X3 "25MHz" SMD3225-4P 106.757,52.411 r270 top

## Footprints (in the part's own frame and the unit in brackets; to place one, negate y for a bottom-side part, rotate by r counter-clockwise, add the part's x,y. Pads: shape width x height; smd on the part's side, far side on the other; paste and mask are expansions set on the pad)
5TJ480000XYLBC_ [mm]
  rect 1.8x1.3 smd mask+0.07: 1(-1.9,-1.15) 2(1.9,-1.15) 3(1.9,1.15) 4(-1.9,1.15)
  silkscreen extent -3.05,-1.65 2.54,1.65, body extent -2.5,-1.6 2.5,1.6, height 1
178.6165.0002 [mm]
  rect 2.2x2.2 hole 1.5 paste-2539.97 mask+0.051: 1(-6.4,1.25)
  round 2.2 hole 1.5 paste-2539.97 mask+0.051: 2(-2.9,1.25) 3(2.9,1.25) 4(6.4,1.25) 5(6.4,-1.25) 6(2.9,-1.25) 7(-2.9,-1.25) 8(-6.4,-1.25)
  round 0 hole 2.5 unplated paste-2539.97: ""(0,0)
  silkscreen extent -10.03,-3.05 10.03,3.05, body extent -10,-3 10,3, height 17.5
0630CDMCCDS_6R8MC [mm]
  rect 2.35x3.5 smd: 1(-3.025,0) 2(3.025,0)
  silkscreen extent -3.71,-3.3 3.71,3.3, body extent -3.65,-3.3 3.65,3.3, height 3
1715721 [mm]
  rect 2.5x2.5 / inner round 2.5 / far side rect 2.5x2.5 hole 1.3: 1(-2.54,0)
  round 2.5 hole 1.3: 2(2.54,0)
  silkscreen extent -5.08,-4.6 5.08,5.2, body extent -5.64,-4.62 5.09,5.21, height 14.2
B2B-XH-A(LF)(SN)_ [mm]
  rect 2x2 hole 1: 1(-1.25,0)
  round 2 hole 1: 2(1.25,0)
  silkscreen extent -3.78,-3.43 3.74,2.44, body extent -3.72,-3.37 3.68,2.38, height 7
B3B-XH-A(LF)(SN)_ [mm]
  rect 2x2 hole 1: 1(-3.81,0)
  round 2 hole 1: 2(-1.27,0) 3(1.27,0)
  silkscreen extent -6.32,-2.46 3.78,3.48, body extent -6.22,-2.36 3.68,3.39, height 7
B3U-1000P [mm] "SWITCH TACTILE SPST-NO 0.05A 12V"
  rect 0.82x1.72 smd: 1(-1.7,0) 2(1.7,0)
  silkscreen extent -1.57,-1.3 1.57,1.3, body extent -2,-1.26 2,1.24, height 1.6
B5B-XH-A(LF)(SN)_ [mm] "XH Header Male Pin 0.098\"(2.50mm) 5 Through Hole,P=2.5mm Wire To Board / Wire To Wire Connector RoHS"
  rect 1.9x1.9 hole 1: 1(-5,0)
  round 1.9 hole 1: 2(-2.5,0) 3(0,0) 4(2.5,0) 5(5,0)
  silkscreen extent -7.49,-2.39 7.47,3.45, body extent -7.45,-2.34 7.45,3.41, height 7
cap-0402 [mil]
  rect 18x25 smd mask+2.36: 1(-18.5,0) 2(18.5,0)
  silkscreen extent -31,-16 31,16, body extent -20,-10 20,10, height 19
Cap-0402 [mil]
  rect 18x25 smd mask+2.36: 1(-18.5,0) 2(18.5,0)
  silkscreen extent -31,-16 31,16, body extent -20,-10 20,10, height 19
Cap-0603 [mil]
  rect 30x35 smd mask+2.36: 1(-30,0) 2(30,0)
  silkscreen extent -49,-21 49,21, body extent -32,-16 31,16, height 34
Cap-0805 [mil] "SMD 0805"
  rect 40x60 smd mask+2.76: 1(-40,0) 2(40,0)
  silkscreen extent -64,-34 64,34, body extent -39,-25 39,25, height 30
Cap-1206 [mil] "SMD 1206"
  rect 60x70 smd: 1(-50,0) 2(50,0)
  silkscreen extent -84,-39 84,39, body extent -63,-31 63,32, height 39
CAT24C256WI-GT3 [mm]
  rect 1.57x0.62 smd: 1(-2.7,1.905) 2(-2.7,0.635) 3(-2.7,-0.635) 4(-2.7,-1.905) 5(2.7,-1.905) 6(2.7,-0.635) 7(2.7,0.635) 8(2.7,1.905)
  silkscreen extent -3,-2.44 1.85,2.64, body extent -3,-2.45 3,2.45, height 1.75
DB128L-5.08-3P-BK-S [mm]
  round 3 hole 1.6 paste-2539.97 mask+0.051: 1(-5.08,0) 2(0,0) 3(5.08,0)
  silkscreen extent -7.73,-4.85 8.22,5.15, body extent -7.62,-4.9 8.22,5.1, height 14
DSIC03LSGET [mil]
  rect 90x60 smd paste+0 mask+2: 1(-177.16,100) 2(-177.16,0) 3(-177.16,-100) 4(177.16,-100) 5(177.16,0) 6(177.16,100)
  silkscreen extent -118,-150 118,150, body extent -183,-150 183,150, height 163
DSN0603-2 [mm]
  rect 0.2x0.24 smd mask+0.055: 1(-0.2,0) 2(0.2,0)
  silkscreen extent -0.38,-0.2 0.38,0.2, body extent -0.3,-0.15 0.3,0.15, height 0.32
Fuse-1812_ [mm]
  rect 1.78x3.2 smd: 1(-2.49,0) 2(2.49,0)
  silkscreen extent -1.75,-1.8 1.85,1.8, body extent -2.36,-1.74 2.37,1.74, height 1.03
HDR1X2_ [mm] "CONN HEADER VERT 2POS 2.54MM"
  rect 1.5x1.5 hole 0.9: 1(0,0)
  round 1.5 hole 0.9: 2(2.54,0)
  silkscreen extent -1.27,-1.27 3.81,1.27, body extent -1.27,-1.27 3.81,1.27, height 8.44
HDR1X3_ [mm] "Connector; Header; 3 Position"
  rect 1.5x1.5 hole 0.9: 1(0,0)
  round 1.5 hole 0.9: 2(2.54,0) 3(5.08,0)
  silkscreen extent -1.27,-1.27 6.35,1.27, body extent -1.27,-1.24 6.35,1.25, height 8.54
HDR1X4_ [mm] "Connector; Header; 4 Position"
  rect 1.6x1.6 hole 0.95: 1(0,0)
  round 1.6 hole 0.95: 2(2.54,0) 3(5.08,0) 4(7.62,0)
  silkscreen extent -1.27,-1.27 8.89,1.27, body extent -1.27,-1.27 8.89,1.27, height 9.5
"HDR 1x8 TH male" [mm]
  rect 1.8x1.8 hole 1 paste-2539.97 mask+0.051: 1(-8.89,0)
  round 1.8 hole 1 paste-2539.97 mask+0.051: 2(-6.35,0) 3(-3.81,0) 4(-1.27,0) 5(1.27,0) 6(3.81,0) 7(6.35,0) 8(8.89,0)
  silkscreen extent -10.16,-1.27 10.16,1.27, body extent -10.26,-1.25 10.27,1.25, height 8.5
HR911105A [mm]
  rect 1.398x1.398 hole 0.89: 1(4.45,-4.355)
  round 1.398 hole 0.89: 2(3.18,-6.895) 3(1.91,-4.355) 4(0.64,-6.895) 5(-0.63,-4.355) 6(-1.9,-6.895) 7(-3.17,-4.355) 8(-4.44,-6.895)
  round 1.53 hole 1.02: 9(6.625,6.895) 10(4.085,6.895) 11(-4.085,6.895) 12(-6.625,6.895)
  round 0 hole 3.25 unplated: MH1(-5.715,1.995) MH2(5.715,1.995)
  round 2.445 hole 1.63: "Shield 1"(-7.745,-1.055) "Shield 2"(7.745,-1.055)
  silkscreen extent -8,-8.48 8,12.92, body extent -8.02,-8.42 8.02,12.88, height 13.5
IND-0402 [mm]
  rect 0.4x0.6 smd: 1(-0.35,0) 2(0.35,0)
  silkscreen extent -0.71,-0.46 0.71,0.46, body extent -0.5,-0.25 0.5,0.25, height 0.25
"IND-0603 (1608 Metric)" [mm] "0.063\" L x 0.032\" W (1.60mm x 0.80mm)"
  rect 0.6x0.8 smd: 1(-0.7,0) 2(0.7,0)
  silkscreen extent -0.2,-0.46 0.23,0.46, body extent -0.8,-0.4 0.8,0.4, height 0.78
LED-0603 [mm]
  rect 0.5x1 smd: 1(-0.75,0) 2(0.75,0)
  silkscreen extent -1.12,-0.66 1.75,0.66, body extent -0.82,-0.37 0.82,0.36, height 0.68
LQFP-64(10x10) [mm]
  rect 1.2x0.3 smd paste+0 mask+0.051: 1(-5.75,3.75) 2(-5.75,3.25) 3(-5.75,2.75) 4(-5.75,2.25) 5(-5.75,1.75) 6(-5.75,1.25) 7(-5.75,0.75) 8(-5.75,0.25) 9(-5.75,-0.25) 10(-5.75,-0.75) 11(-5.75,-1.25) 12(-5.75,-1.75) 13(-5.75,-2.25) 14(-5.75,-2.75) 15(-5.75,-3.25) 16(-5.75,-3.75) 33(5.75,-3.75) 34(5.75,-3.25) 35(5.75,-2.75) 36(5.75,-2.25) 37(5.75,-1.75) 38(5.75,-1.25) 39(5.75,-0.75) 40(5.75,-0.25) 41(5.75,0.25) 42(5.75,0.75) 43(5.75,1.25) 44(5.75,1.75) 45(5.75,2.25) 46(5.75,2.75) 47(5.75,3.25) 48(5.75,3.75)
  rect 0.3x1.2 smd paste+0 mask+0.051: 17(-3.75,-5.75) 18(-3.25,-5.75) 19(-2.75,-5.75) 20(-2.25,-5.75) 21(-1.75,-5.75) 22(-1.25,-5.75) 23(-0.75,-5.75) 24(-0.25,-5.75) 25(0.25,-5.75) 26(0.75,-5.75) 27(1.25,-5.75) 28(1.75,-5.75) 29(2.25,-5.75) 30(2.75,-5.75) 31(3.25,-5.75) 32(3.75,-5.75) 49(3.75,5.75) 50(3.25,5.75) 51(2.75,5.75) 52(2.25,5.75) 53(1.75,5.75) 54(1.25,5.75) 55(0.75,5.75) 56(0.25,5.75) 57(-0.25,5.75) 58(-0.75,5.75) 59(-1.25,5.75) 60(-1.75,5.75) 61(-2.25,5.75) 62(-2.75,5.75) 63(-3.25,5.75) 64(-3.75,5.75)
  silkscreen extent -6.64,-5 5,5, body extent -6,-6 6,6, height 1.6
MC-306 [mm]
  rect 1.3x1.9 smd: 1(-2.75,-1.6) 2(2.75,-1.6) 3(2.75,1.6) 4(-2.75,1.6)
  silkscreen extent -4.06,-1.96 4.06,1.96, body extent -4,-1.9 4,1.9, height 2.54
QFN-64-EP(9x9) [mm]
  rect 0.762x0.254 smd: 1(-4.4,3.75)
  rect 0.7x0.25 smd: 2(-4.4,3.25) 3(-4.4,2.75) 4(-4.4,2.25) 5(-4.4,1.75) 6(-4.4,1.25) 7(-4.4,0.75) 8(-4.4,0.25) 9(-4.4,-0.25) 10(-4.4,-0.75) 11(-4.4,-1.25) 12(-4.4,-1.75) 13(-4.4,-2.25) 14(-4.4,-2.75) 15(-4.4,-3.25) 16(-4.4,-3.75) 33(4.4,-3.75) 34(4.4,-3.25) 35(4.4,-2.75) 36(4.4,-2.25) 37(4.4,-1.75) 38(4.4,-1.25) 39(4.4,-0.75) 40(4.4,-0.25) 41(4.4,0.25) 42(4.4,0.75) 43(4.4,1.25) 44(4.4,1.75) 45(4.4,2.25) 46(4.4,2.75) 47(4.4,3.25) 48(4.4,3.75)
  rect 0.25x0.7 smd: 17(-3.75,-4.4) 18(-3.25,-4.4) 19(-2.75,-4.4) 20(-2.25,-4.4) 21(-1.75,-4.4) 22(-1.25,-4.4) 23(-0.75,-4.4) 24(-0.25,-4.4) 25(0.25,-4.4) 26(0.75,-4.4) 27(1.25,-4.4) 28(1.75,-4.4) 29(2.25,-4.4) 30(2.75,-4.4) 31(3.25,-4.4) 32(3.75,-4.4) 49(3.75,4.4) 50(3.25,4.4) 51(2.75,4.4) 52(2.25,4.4) 53(1.75,4.4) 54(1.25,4.4) 55(0.75,4.4) 56(0.25,4.4) 57(-0.25,4.4) 58(-0.75,4.4) 59(-1.25,4.4) 60(-1.75,4.4) 61(-2.25,4.4) 62(-2.75,4.4) 63(-3.25,4.4) 64(-3.75,4.4)
  rect 7.15x7.15 smd: 65(0,0)
  silkscreen extent -5,-4.5 4.54,4.5, body extent -4.52,-4.52 4.52,4.52, height 0.9
Res-0201 [mm]
  rect 0.27x0.37 smd mask+0.055: 1(-0.275,0) 2(0.275,0)
  silkscreen extent -0.48,-0.25 0.48,0.25, body extent -0.3,-0.15 0.3,0.15, height 0.29
Res-0402 [mil]
  rect 18x25 smd mask+2.17: 1(-18.5,0) 2(18.5,0)
  silkscreen extent -32,-17 32,16, body extent -23,-11 23,11, height 16
Res-0603 [mil]
  rect 30x35 smd: 1(-30,0) 2(30,0)
  silkscreen extent -48,-21 48,21, body extent -31,-17 31,17, height 18
SMA [mm]
  rect 2.5x1.7 smd: 1(-2,0) 2(2,0)
  silkscreen extent -4.44,-1.42 2.06,1.42, body extent -2.6,-1.3 2.6,1.3, height 2.4
"SMB Bi Directional" [mm]
  rect 2.8x2.4 smd: 1(-2.3,0) 2(2.3,0)
  silkscreen extent -2.21,-1.85 2.39,1.85, body extent -2.7,-1.8 2.7,1.8, height 2.3
SMB_ [mm]
  rect 2.8x2.4 smd: 1(-2.3,0) 2(2.3,0)
  silkscreen extent -2.21,-1.91 4.83,1.9, body extent -2.7,-1.8 2.7,1.8, height 2.3
SMD3225-4P [mm]
  rect 1.4x1.2 smd: 1(-1.1,-0.85) 2(1.1,-0.85) 3(1.1,0.85) 4(-1.1,0.85)
  silkscreen extent -2.08,-1.3 1.65,1.3, body extent -1.6,-1.25 1.6,1.25, height 0.81
SOD-323 [mm]
  rect 0.8x0.9 smd mask+0.055: 1(-1.15,0) 2(1.15,0)
  silkscreen extent -2.01,-0.79 0.94,0.79, body extent -1.3,-0.67 1.3,0.67, height 1.1
SOD-923. [mm]
  rect 0.36x0.27 smd: 1(-0.42,0) 2(0.42,0)
  silkscreen extent -1,-0.43 0.46,0.43, body extent -0.52,-0.32 0.53,0.33, height 0.43
SON-8-EP(3x3) [mm]
  rect 0.6x0.3 smd paste+0 mask+0.051: 1(-1.4,0.975) 2(-1.4,0.325) 3(-1.4,-0.325) 4(-1.4,-0.975) 5(1.4,-0.975) 6(1.4,-0.325) 7(1.4,0.325) 8(1.4,0.975)
  rect 1.65x2.4 smd paste+0 mask+0.051: 9(0,0)
  silkscreen extent -2.01,-1.47 1.47,1.47, body extent -1.51,-1.5 1.51,1.5, height 1.01
SOP-8 [mm]
  rect 1.3x0.7 smd: 1(-2.75,1.905) 2(-2.75,0.635) 3(-2.75,-0.635) 4(-2.75,-1.905) 5(2.75,-1.905) 6(2.75,-0.635) 7(2.75,0.635) 8(2.75,1.905)
  silkscreen extent -3.69,-2.57 2.03,2.57, body extent -3.1,-2.5 3.1,2.5, height 1.76
SOP-16 [mil]
  rect 57.55x22 smd: 1(-107.27,175) 2(-107.27,125) 3(-107.27,75) 4(-107.27,25) 5(-107.27,-25) 6(-107.27,-75) 7(-107.27,-125) 8(-107.27,-175) 9(107.27,-175) 10(107.27,-125) 11(107.27,-75) 12(107.27,-25) 13(107.27,25) 14(107.27,75) 15(107.27,125) 16(107.27,175)
  silkscreen extent -149,-199 84,199, body extent -122,-197 122,197, height 69
SOT-23 [mm] "TRANS NPN 40V 0.6A SOT23"
  rect 0.82x0.92 smd: 1(-0.95,-1) 2(0.95,-1) 3(0,1)
  silkscreen extent -1.68,-1.3 1.55,0.81, body extent -1.5,-1.25 1.5,1.25, height 1.05
"SOT- 223" [mm]
  rect 1.5x2 smd: 1(-2.3,-3.05) 2(0,-3.05) 3(2.3,-3.05)
  rect 3.8x2 smd: 4(0,3.05)
  silkscreen extent -3.35,-3.2 3.3,1.8, body extent -3.25,-3.5 3.25,3.5, height 1.61
T44001 [mm]
  round 2.9 hole 1.9 paste-2539.97 mask+0.051: 1(-2.5,-3.6) 1(-2.5,3.6) 1(2.5,-3.6) 1(2.5,3.6)
  silkscreen extent -4,-4 4,4, body extent -4.1,-4.1 4.1,4.1, height 9.93
Test-point [mil]
  oct 60x60 smd: 1(0,0)
  silkscreen extent -37,-37 37,37
TSOT-23-6 [mm]
  rect 1x0.6 smd: 1(-1.2,0.95) 2(-1.2,0) 3(-1.2,-0.95) 4(1.2,-0.95) 5(1.2,0) 6(1.2,0.95)
  silkscreen extent -1.98,-1.5 0.86,1.5, body extent -1.41,-1.45 1.41,1.45, height 1
TSSOP-20 [mm]
  rect 1.6x0.32 smd: 1(-2.8,2.925) 2(-2.8,2.275) 3(-2.8,1.625) 4(-2.8,0.975) 5(-2.8,0.325) 6(-2.8,-0.325) 7(-2.8,-0.975) 8(-2.8,-1.625) 9(-2.8,-2.275) 10(-2.8,-2.925) 11(2.8,-2.925) 12(2.8,-2.275) 13(2.8,-1.625) 14(2.8,-0.975) 15(2.8,-0.325) 16(2.8,0.325) 17(2.8,0.975) 18(2.8,1.625) 19(2.8,2.275) 20(2.8,2.925)
  silkscreen extent -3.88,-3.3 1.95,3.3, body extent -3.2,-3.25 3.2,3.25, height 1.2
TYPE-C-31-M-12_ [mm]
  rect 0.6x1.2 smd: A1/B12(-3.2,2.375) A4/B9(-2.4,2.375) B1/A12(3.2,2.375) B4/A9(2.4,2.375)
  rect 0.3x1.2 smd: A5(-1.25,2.375) A6(-0.25,2.375) A7(0.25,2.375) A8(1.25,2.375) B5(1.75,2.375) B6(0.75,2.375) B7(-0.75,2.375) B8(-1.75,2.375)
  round 0 hole 0.62 unplated: MH(-2.89,1.305) MH(2.89,1.305)
  oval 0.9x2 hole 0.6 slot 1.7 at 90 deg: S1(4.325,1.805) S4(-4.325,1.805)
  oval 0.9x1.7 hole 0.6 slot 1.4 at 90 deg: S2(4.325,-2.375) S3(-4.325,-2.375)
  silkscreen extent -4.5,-3.57 4.5,0.44, body extent -4.47,-5.01 4.47,2.89, height 3.31
UCD-220uF-10mmDia [mm] "0.406\" L x 0.406\" W (10.30mm x 10.30mm)"
  rect 4x2.5 smd: 1(-4,0) 2(4,0)
  silkscreen extent -5.95,-5.21 5.13,5.21, body extent -5.45,-5.15 5.45,5.15, height 10.8
VSON-14(3x4.5) [mm]
  rect 0.6x0.3 smd paste-100 mask+0.051: 1(-1.4,1.95) 2(-1.4,1.3) 3(-1.4,0.65) 4(-1.4,0) 5(-1.4,-0.65) 6(-1.4,-1.3) 7(-1.4,-1.95) 8(1.4,-1.95) 9(1.4,-1.3) 10(1.4,-0.65) 11(1.4,0) 12(1.4,0.65) 13(1.4,1.3) 14(1.4,1.95)
  rect 1.6x4.2 smd paste-100 mask+0.051: 15(0,0)
  silkscreen extent -1.97,-2.29 1.47,2.29, body extent -1.5,-2.25 1.5,2.25, height 1
X12ADIWA3DY1027 [mm]
  round 1.5 hole 0.9 paste-2539.97 mask+0.051: 1(3.57,0.38) 2(2.55,2.16) 3(1.53,0.38) 4(0.51,2.16) 5(-0.51,0.38) 6(-1.53,2.16) 7(-2.55,0.38) 8(-3.57,2.16)
  round 0 hole 3.25 unplated paste-2539.97: ""(-6.35,-2.16) ""(6.35,-2.16)
  silkscreen extent -8,-7.16 8,8.04, body extent -7.97,-7.21 8.03,7.99, height 12.94

## Part data
C1 C2: library part UCD1H221MNL1GS, "CAP ALUM 220UF 20% 50V SMD", Case/Package=Radial, LCSC Part Number=C116211, Leakage Current=3uA, Manufacturer=Nichicon, Max Operating Temperature=105°C, Min Operating Temperature=-55°C, Package Quantity=1, Ripple Current=700mA, Supplier Part Number 1=493-6390-1-ND, Tolerance=20%, Voltage=50V, Capacitance=220uF, Category="Aluminum Electrolytic Capacitors", ComponentLink1Description=https://datasheet.ciiva.com/11776/0900766b80ebdadd-11776792.pdf?src-supplier=RSComponents, ComponentLink1URL=https://datasheet.ciiva.com/11776/0900766b80ebdadd-11776792.pdf?src-supplier=RSComponents, ComponentLink2Description=https://datasheet.ciiva.com/5362/e-cd-22158-5362489.pdf?src-supplier=Mouser, ComponentLink2URL=https://datasheet.ciiva.com/5362/e-cd-22158-5362489.pdf?src-supplier=Mouser, ComponentLink3Description=https://datasheet.ciiva.com/11684/e-cd-11684678.pdf?src-supplier=Avnet, ComponentLink3URL=https://datasheet.ciiva.com/11684/e-cd-11684678.pdf?src-supplier=Avnet, ComponentLink4Description=https://datasheet.ciiva.com/15037/e-cd-15037119.pdf?src-supplier=Digi-Key, ComponentLink4URL=https://datasheet.ciiva.com/15037/e-cd-15037119.pdf?src-supplier=Digi-Key, ComponentLink5Description=https://datasheet.ciiva.com/16393/e-cd-16393493.pdf?src-supplier=Future+Electronics, ComponentLink5URL=https://datasheet.ciiva.com/16393/e-cd-16393493.pdf?src-supplier=Future+Electronics, ComponentLink6Description=https://datasheet.ciiva.com/17354/e-cd-17354606.pdf?src-supplier=Avnet+Europe, ComponentLink6URL=https://datasheet.ciiva.com/17354/e-cd-17354606.pdf?src-supplier=Avnet+Europe, Construction=Cylindrical, Diameter=10mm, Dissipation Factor=0.1%, Features="General Purpose", Height=10mm, Height - Seated (Max)=0.394inch, Impedance=160mR, Item Type=Capacitor, Lead Free="Lead Free", Length=10mm, Life (Hours)=5000Hour, Manufacturer Part Number=UCD1H221MNL1GS, Mount="Surface Mount,PCB", Packaging="Tape and Reel", Pricing 1="1=0.85000, 10=0.60200, 50=0.45480, 100=0.39620 (USD)", Radiation Hardening=No, RoHS=Yes, RoHS Compliant=Yes, Series=CD, Supplier 1=Digi-Key, Termination=SMD/SMT, Voltage Rating=50V, Voltage Rating (DC)=50V
C4: library part CC1206KKX5R9BB106, "CAP CER 10UF 50V X5R 1206", Case Code (Imperial)=1206, Case Code (Metric)=3216, Dielectric=X5R, LCSC Part Number=C100122, Manufacturer=Yageo, Max Operating Temperature=85°C, Min Operating Temperature=-55°C, Supplier Part Number=2072123, Tolerance=10%, Voltage Rating=50V, Case/Package=1206, ComponentLink1Description=https://datasheet.octopart.com/CC1206KKX5R9BB106-Yageo-datasheet-170350636.pdf?src-supplier=Future+Electronics, ComponentLink1URL=https://datasheet.octopart.com/CC1206KKX5R9BB106-Yageo-datasheet-170350636.pdf?src-supplier=Future+Electronics, ComponentLink2Description=https://datasheet.octopart.com/CC1206KKX5R9BB106-Yageo-datasheet-145016144.pdf?src-supplier=Future+Electronics, ComponentLink2URL=https://datasheet.octopart.com/CC1206KKX5R9BB106-Yageo-datasheet-145016144.pdf?src-supplier=Future+Electronics, ComponentLink3Description=http://www.yageo.com/documents/recent/UPY-GPHC_X5R_4V-to-50V_25.pdf?src-supplier=Digikey, ComponentLink3URL=http://www.yageo.com/documents/recent/UPY-GPHC_X5R_4V-to-50V_25.pdf?src-supplier=Digikey, Halogen Free="Halogen Free", Height=1.9mm, Item Type=Capacitors, Lead Free="Lead Free", Length=0.126inch, Manufacturer Part Number=CC1206KKX5R9BB106, Material=4241ConductorMaterial, Mounting Technology="Surface Mount", Packaging="Cut Tape", Pricing="2000=0.0907, 6000=0.0872, 10000=0.0856, 30000=0.0823, 50000=0.0795 (USD)", RoHS=Yes, RoHS Compliant=Yes, Series=CC, Stock=220000, Supplier="Future Electronics", Thickness=0.075inch, Voltage Rating (DC)=50V, Width=0.063inch
C5 C16 C17 C18 C19 C21 C39 C40 C42 C43 C44 C45 C46 C48 C50 C51 C52 C53 C54 C55 C56: library part C1005X7R1H104KT000F, "CAP CER 0.1UF 50V X7R 0402", Dielectric=X7R, LCSC Part Number=C361198, Manufacturer=TDK, Tolerance=10%, Voltage=25V, Category="Ceramic Capacitors", ComponentLink1Description=LCSC, ComponentLink1URL=https://www.lcsc.com/product-detail/Multilayer-Ceramic-Capacitors-MLCC-SMD-SMT_TDK-C1005X7R1H104KT000F_C361198.html, Item Type=Capacitor, Manufacturer Part Number=C1005X7R1H104KT000F, RoHS=No, Supplier 1=Avnet, Supplier Part Number 1=C1005X7R1H104KT000F
C6: library part C1005X5R1H104K050BB, "CAP CER 0.1UF 50V X5R 0402", Capacitance=100nF, Case Code (Imperial)=0402, Case Code (Metric)=1005, Dielectric=X5R, Dielectric Material=Ceramic, LCSC Part Number=C2181865, Manufacturer=TDK, Max Operating Temperature=85°C, Min Operating Temperature=-55°C, Package Quantity=1, Supplier Part Number 1=445-5942-1-ND, Tolerance=10%, Voltage=50V, Case/Package=0402, ComponentLink1Description=https://product.tdk.com/info/en/catalog/spec/mlccspec_commercial_general_midvoltage_en.pdf?src-supplier=Digi-Key, ComponentLink1URL=https://product.tdk.com/info/en/catalog/spec/mlccspec_commercial_general_midvoltage_en.pdf?src-supplier=Digi-Key, ComponentLink2Description=http://www.tdk.co.jp/tefe02/e413_c.pdf?src-supplier=Future+Electronics, ComponentLink2URL=http://www.tdk.co.jp/tefe02/e413_c.pdf?src-supplier=Future+Electronics, ComponentLink3Description=https://www.verical.com/server-webapp/html/getDatasheet?partID=743571&src-supplier=Verical, ComponentLink3URL=https://www.verical.com/server-webapp/html/getDatasheet?partID=743571&src-supplier=Verical, ComponentLink4Description=http://www.tdk.co.jp/tefe02/e412_c.pdf?src-supplier=Avnet+Europe, ComponentLink4URL=http://www.tdk.co.jp/tefe02/e412_c.pdf?src-supplier=Avnet+Europe, Construction=Flat, Depth=0.5mm, Height=0.5mm, Item Type=Capacitor, Lead Free="Lead Free", Length=1mm, Manufacturer Part Number=C1005X5R1H104K050BB, Mount="Surface Mount", Packaging="Tape and Reel", Pricing 1="1=0.12, 10=0.09, 50=0.049, 100=0.04, 500=0.02858, 1000=0.02245, 2500=0.02041, 5000=0.01878 (USD)", Radiation Hardening=No, REACH SVHC="No SVHC", Resistor Type=Ceramic, RoHS Compliant=Yes, Series=C, Stock 1=1455182, Supplier 1=Digi-Key, Termination=SMD/SMT, Thickness=0.022inch, Voltage Rating=50V, Voltage Rating (DC)=50V, Weight=2.3E-05oz, Width=0.02inch
C7: library part GCM1555C1H470FA16D, "CAP CER 47PF 50V C0G/NP0 0402", Case Code (Imperial)=0402, Case Code (Metric)=1005, LCSC Part Number=C393684, Manufacturer=Murata, Max Operating Temperature=125°C, Min Operating Temperature=-55°C, Ratings=AEC-Q200, Supplier Part Number 1=490-16445-1-ND, Tolerance=1%, Voltage Rating=50V, Capacitance=47pF, Case/Package=0402, Category="Ceramic Capacitors", ComponentLink1Description=http://search.murata.co.jp/Ceramy/image/img/A01X/G101/ENG/GCM1555C1H470FA16-01.pdf?src-supplier=Digi-Key, ComponentLink1URL=http://search.murata.co.jp/Ceramy/image/img/A01X/G101/ENG/GCM1555C1H470FA16-01.pdf?src-supplier=Digi-Key, Manufacturer Part Number=GCM1555C1H470FA16D, Mount="Surface Mount", Packaging="Tape and Reel", Pricing 1="1=0.11000, 10=0.07900, 50=0.04500, 100=0.03730, 500=0.02618, 1000=0.02168, 2500=0.02018, 5000=0.01846 (USD)", RoHS=No, Stock 1=27098, Supplier 1=Digi-Key
C8 C9: library part CC0805MKX5R8BB226, "CAP CER 22UF 25V X5R 0805", Case Code (Imperial)=0805, Case Code (Metric)=2012, Dielectric=X5R, LCSC Part Number=C784585, Manufacturer=Yageo, Max Operating Temperature=85°C, Min Operating Temperature=-55°C, Package Quantity=3000, Supplier Part Number 1=311-1903-1-ND, Tolerance=20%, Voltage Rating=25V, Capacitance=22uF, Case/Package=0805, Category="Ceramic Capacitors", ComponentLink1Description=http://www.mouser.com/ds/2/447/Yageo_UPY-GP_NP0_16V-to-50V_9-358835.pdf?src-supplier=Mouser, ComponentLink1URL=http://www.mouser.com/ds/2/447/Yageo_UPY-GP_NP0_16V-to-50V_9-358835.pdf?src-supplier=Mouser, ComponentLink2Description=http://www.yageo.com/documents/recent/UPY-GPHC_X5R_4V-to-50V_25.pdf?src-supplier=Digi-Key, ComponentLink2URL=http://www.yageo.com/documents/recent/UPY-GPHC_X5R_4V-to-50V_25.pdf?src-supplier=Digi-Key, Halogen Free="Halogen Free", Height=1.25mm, Item Type=Capacitor, Lead Free="Lead Free", Length=0.079inch, Manufacturer Part Number=CC0805MKX5R8BB226, Mount="Surface Mount", Packaging="Tape and Reel", Pricing 1="1=0.47000, 10=0.33300, 50=0.25140, 100=0.21900, 500=0.16222, 1000=0.13789 (USD)", RoHS=Yes, RoHS Compliant=Yes, Stock 1=64970, Supplier 1=Digi-Key, Termination=SMD/SMT, Thickness=0.057inch, Voltage Rating (DC)=25V, Weight=0.000194oz, Width=0.049inch
C10 C11: library part CC0603KRX5R7BB475, "CAP CER 4.7UF 16V X5R 0603", Case Code (Imperial)=0603, Case Code (Metric)=1608, Dielectric=X5R, LCSC Part Number=C277476, Manufacturer=Yageo, Max Operating Temperature=85°C, Min Operating Temperature=-55°C, Resistor Type=Ceramic, Supplier Part Number 1=311-1785-1-ND, Tolerance=10%, Voltage Rating=16V, Capacitance=4.7uF, Case/Package=0603, Category="Ceramic Capacitors", ComponentLink1Description=http://www.mouser.com/ds/2/447/UPY-GPHC_X5R_4V-to-50V_25-1131599.pdf?src-supplier=Mouser, ComponentLink1URL=http://www.mouser.com/ds/2/447/UPY-GPHC_X5R_4V-to-50V_25-1131599.pdf?src-supplier=Mouser, ComponentLink2Description=http://www.yageo.com/documents/recent/UPY-GPHC_X5R_4V-to-50V_25.pdf?src-supplier=Digi-Key, ComponentLink2URL=http://www.yageo.com/documents/recent/UPY-GPHC_X5R_4V-to-50V_25.pdf?src-supplier=Digi-Key, Depth=0.8mm, Halogen Free="Halogen Free", Height=0.8mm, Item Type=Capacitor, Lead Free="Lead Free", Length=1.6mm, Manufacturer Part Number=CC0603KRX5R7BB475, Mount="Surface Mount", Packaging="Tape and Reel", Pricing 1="1=0.20000, 10=0.13800, 50=0.08280, 100=0.06990, 500=0.04784, 1000=0.04233 (USD)", RoHS=Yes, RoHS Compliant=Yes, Series=CC, Stock 1=547703, Supplier 1=Digi-Key, Termination=SMD/SMT, Thickness=0.037inch, Voltage Rating (DC)=16V, Weight=7.1E-05oz, Width=0.8mm
C12 C13 C38 C41: library part CC0402GRNPO9BN300, "CAP CER 30PF 50V C0G/NPO 0402", Case Code (Imperial)=0402, Case Code (Metric)=1005, Dielectric=C0G, LCSC Part Number=C277479, Manufacturer=Yageo, Max Operating Temperature=125°C, Min Operating Temperature=-55°C, Tolerance=2%, Voltage Rating=50V, Case/Package=0402, ComponentLink1Description=https://datasheet.ciiva.com/13263/upy-gp-np0-16v-to-50v-8-3714-13263350.pdf?src-supplier=Mouser, ComponentLink1URL=https://datasheet.ciiva.com/13263/upy-gp-np0-16v-to-50v-8-3714-13263350.pdf?src-supplier=Mouser, Halogen Free=5694HalogenFree, Item Type=Capacitor, Lead Free=5697LeadFree, Length=0.039inch, Manufacturer Part Number=CC0402GRNPO9BN300, Mounting Technology="Surface Mount", Packaging="Tape and Reel", Pricing="1=0.1, 10=0.052, 50=0.0296, 100=0.023, 500=0.01728, 1000=0.01358, 2500=0.01235, 5000=0.01136 (USD)", RoHS=Yes, Series=CC, Stock=114930, Supplier=Digikey, Termination=SMD/SMT, Thickness=0.022inch, Voltage Rating (DC)=50V, Weight=2.3E-05oz, Width=0.02inch
C14 C15: library part CC0402CRNPO9BN6R8, "CAP CER 6.8PF 50V C0G/NPO 0402", Case Code (Imperial)=0402, Case Code (Metric)=1005, Dielectric=C0G, Insulation Resistance=10GR, LCSC Part Number=C189470, Manufacturer=Yageo, Max Operating Temperature=125°C, Min Operating Temperature=-55°C, Supplier Part Number=3247368, Tolerance=2%, Voltage Rating=50V, Case/Package=0402, Category="Ceramic Capacitors", ComponentLink1Description=https://datasheet.ciiva.com/11587/upy-gp-np0-16v-to-50v-8-11587182.pdf?src-supplier=Avnet, ComponentLink1URL=https://datasheet.ciiva.com/11587/upy-gp-np0-16v-to-50v-8-11587182.pdf?src-supplier=Avnet, Construction=Flat, Depth=0.5mm, Height=0.5mm, Item Type=Capacitor, Length=1mm, Manufacturer Part Number=CC0402CRNPO9BN6R8, Mounting Technology="Surface Mount", Packaging="Tape and Reel", Pricing="10000=0.0024, 40000=0.0022, 150000=0.0021, 400000=0.002, 1000000=0.0019 (USD)", Radiation Hardening=No, RoHS=Yes, RoHS Compliant=Yes, Series=CC, Stock=200000, Supplier="Future Electronics", Termination=SMD/SMT, Voltage Rating (DC)=50V, Weight=2.3E-05oz, Width=0.5mm
C20: library part CC0402KRX5R6BB475, "CAP CER 4.7UF 10V X5R 0402", Case Code (Imperial)=0402, Case Code (Metric)=1005, LCSC Part Number=C326586, Manufacturer=Yageo, Max Operating Temperature=85°C, Min Operating Temperature=-55°C, Supplier Part Number 1=3871698, Tolerance=10%, Voltage Rating=10V, Capacitance=4.7uF, Case/Package=0402, Category="Ceramic Capacitors", ComponentLink1Description=http://www.yageo.com/documents/recent/UPY-GPHC_X5R_4V-to-50V_25.pdf?src-supplier=Digi-Key, ComponentLink1URL=http://www.yageo.com/documents/recent/UPY-GPHC_X5R_4V-to-50V_25.pdf?src-supplier=Digi-Key, Manufacturer Part Number=CC0402KRX5R6BB475, Mount="Surface Mount", Packaging="Cut Tape", Pricing 1="10000=0.02310, 50000=0.02100 (GBP)", RoHS=Yes, RoHS Compliant=Yes, Stock 1=20000, Supplier 1=Farnell
C22 C24 C25 C26 C27 C28: library part CC0402JRX7R7BB104, "CAP CER 0.1UF 16V X7R 0402", Case Code (Imperial)=0402, Case Code (Metric)=1005, Dielectric=X7R, LCSC Part Number=C541464, Manufacturer=Yageo, Max Operating Temperature=125°C, Min Operating Temperature=-55°C, Package Quantity=10000, Supplier Part Number=311-1676-1-ND, Tolerance=5%, Voltage Rating=16V, Case/Package=0402, Category="Ceramic Capacitors", ComponentLink1Description=https://datasheet.ciiva.com/13210/upy-gphc-x7r-6-3v-to-50v-8-12304-13210152.pdf?src-supplier=Mouser, ComponentLink1URL=https://datasheet.ciiva.com/13210/upy-gphc-x7r-6-3v-to-50v-8-12304-13210152.pdf?src-supplier=Mouser, Construction=Flat, Halogen Free="Halogen Free", Height=0.5mm, Item Type=Capacitor, Lead Free="Lead Free", Length=0.039inch, Manufacturer Part Number=CC0402JRX7R7BB104, Material=4241ConductorMaterial, Mounting Technology="Surface Mount", Packaging="Tape and Reel", Pricing="1=0.1, 10=0.046, 50=0.0262, 100=0.0203, 500=0.01528, 1000=0.012, 2500=0.01091, 5000=0.01004 (USD)", RoHS=Yes, RoHS Compliant=Yes, Series=CC, Stock=1659111, Supplier=Digikey, Thickness=0.022inch, Voltage Rating (DC)=16V, Width=0.02inch
C23: library part CC0603JRNPO9BN472, "CAP CER 4700PF 50V C0G/NPO 0603", LCSC Part Number=C576818, Manufacturer=Yageo, Supplier Part Number 1=13-CC0603JRNPO9BN472CT-ND, Category="Ceramic Capacitors", ComponentLink1Description=LCSC, ComponentLink1URL=https://www.lcsc.com/product-detail/Multilayer-Ceramic-Capacitors-MLCC-SMD-SMT_YAGEO-CC0603JRNPO9BN472_C576818.html, Item Type=Capacitor, Manufacturer Part Number=CC0603JRNPO9BN472, Pricing 1="1=0.48000, 10=0.33000, 50=0.23100, 100=0.19800, 500=0.14854, 1000=0.12543 (USD)", RoHS=Yes, RoHS Compliant=Yes, Stock 1=31779, Supplier 1=Digi-Key